# Altium PCB top.PcbDoc (part 1 of 2)
Units mm, origin at the board's own origin, x right, y up, seen from the top; angles counter-clockwise.
Board outline 63 x 37 mm, 4 copper layers (L1 (SIG/PWR), L2 (GND), L3 (GND), L4 (SIG/PWR)), stack 1.586 mm thick; 82 components, 50 nets, 261 pads, 300 vias.
Unrouted connection lines stored in the file: 3.
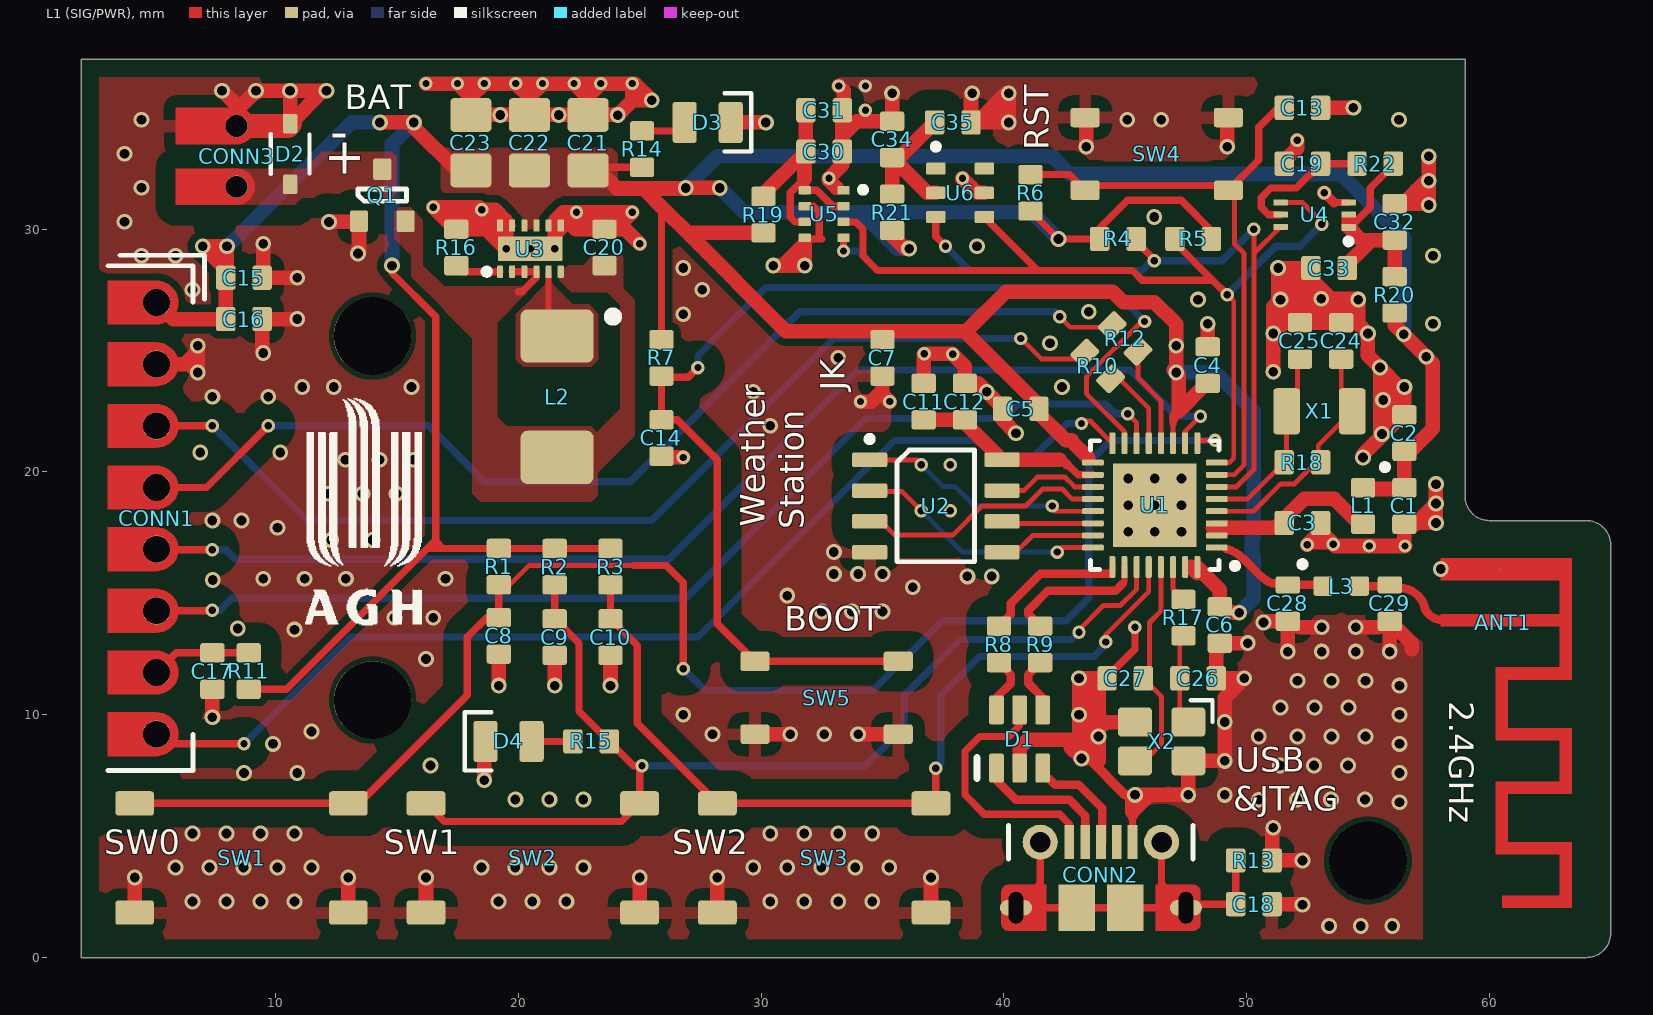
[diagram p0: L1 (SIG/PWR) view]
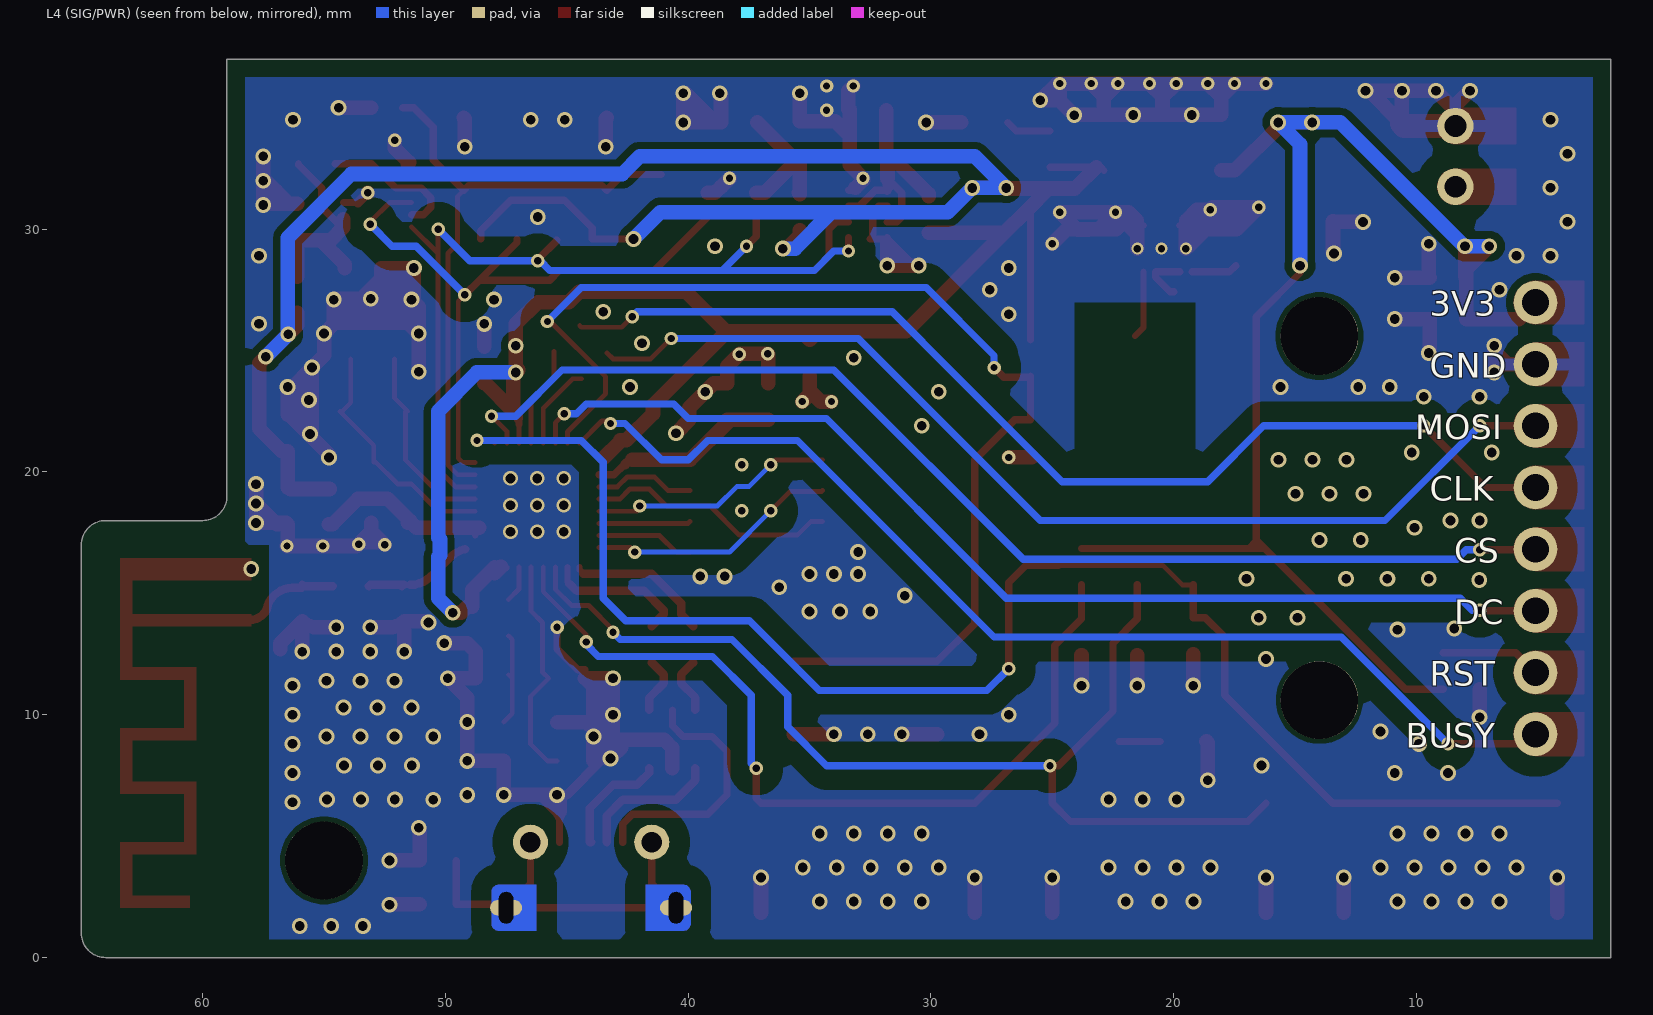
[diagram p1: L4 (SIG/PWR) view, seen from below]
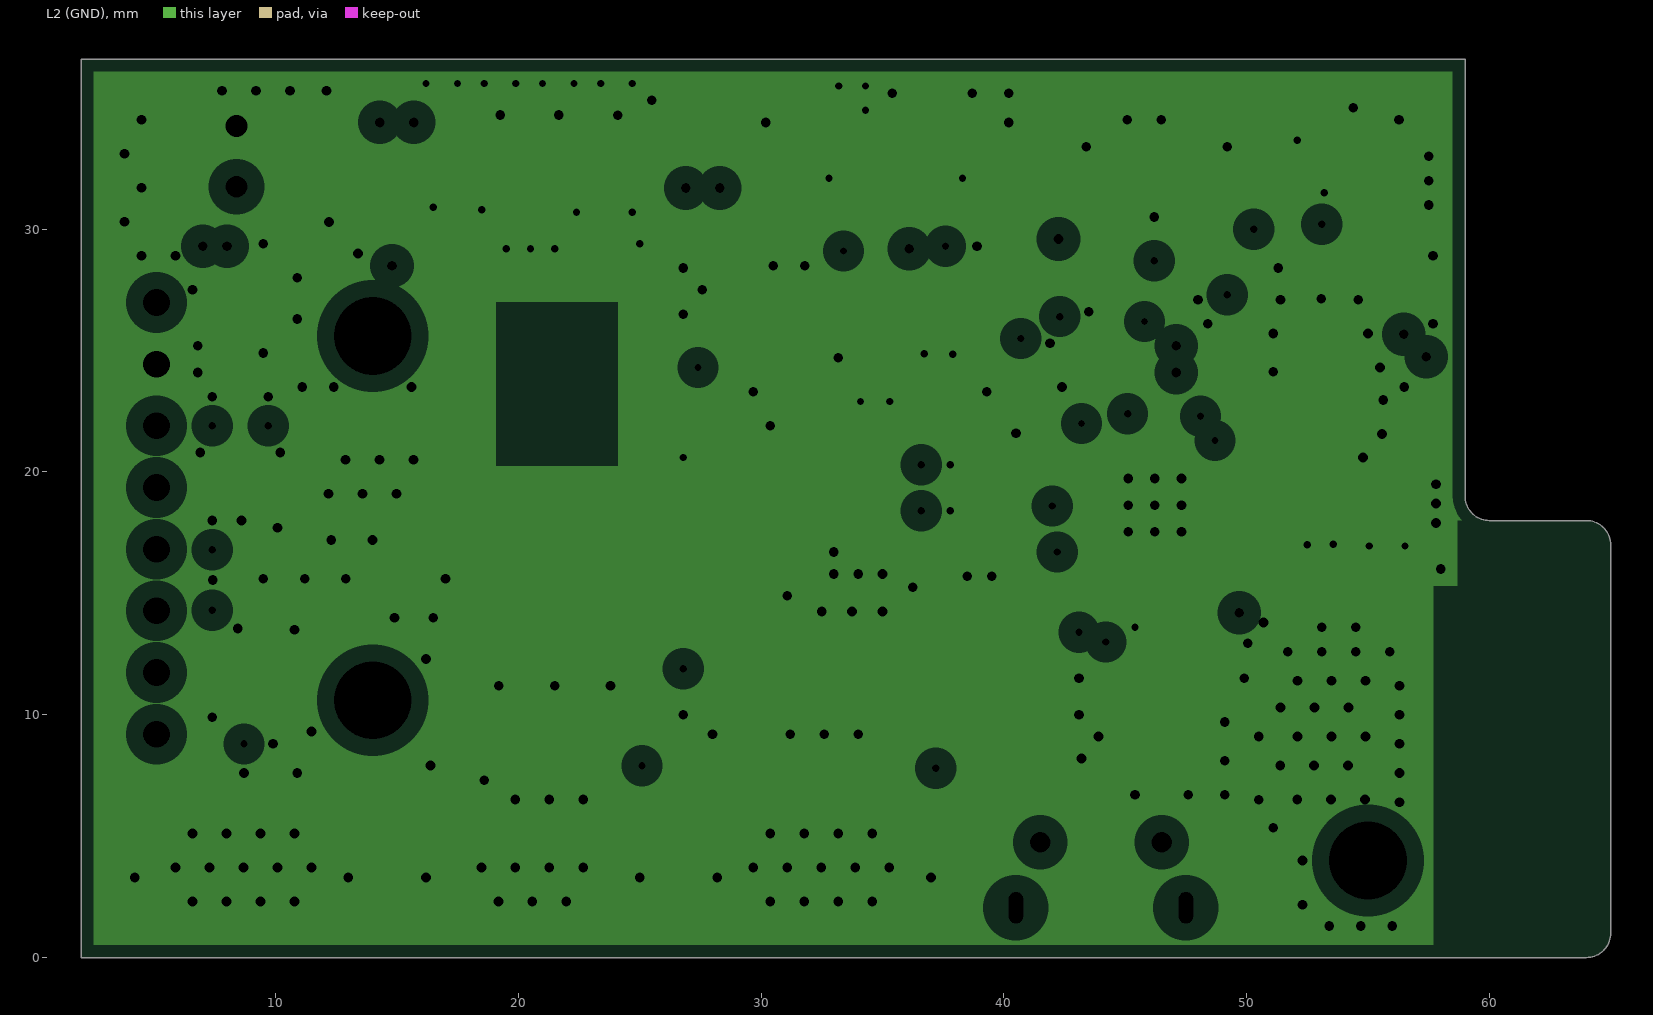
[diagram p2: L2 (GND), clearances drawn from the general rule]
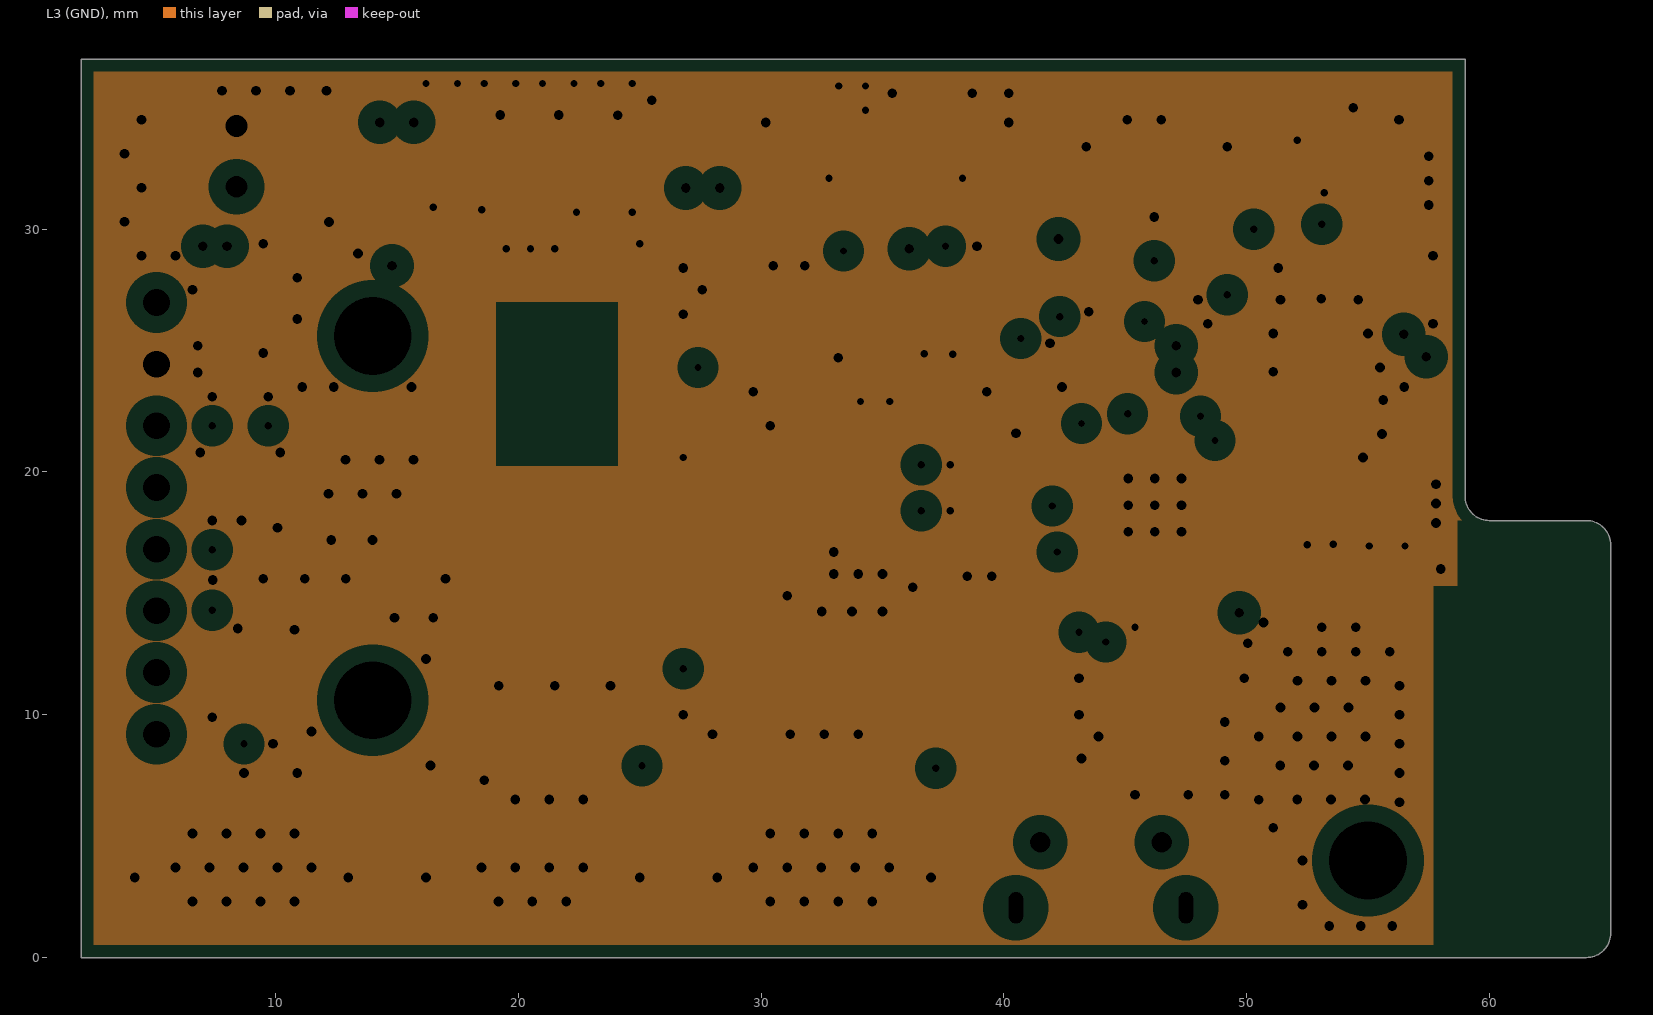
[diagram p3: L3 (GND), clearances drawn from the general rule]
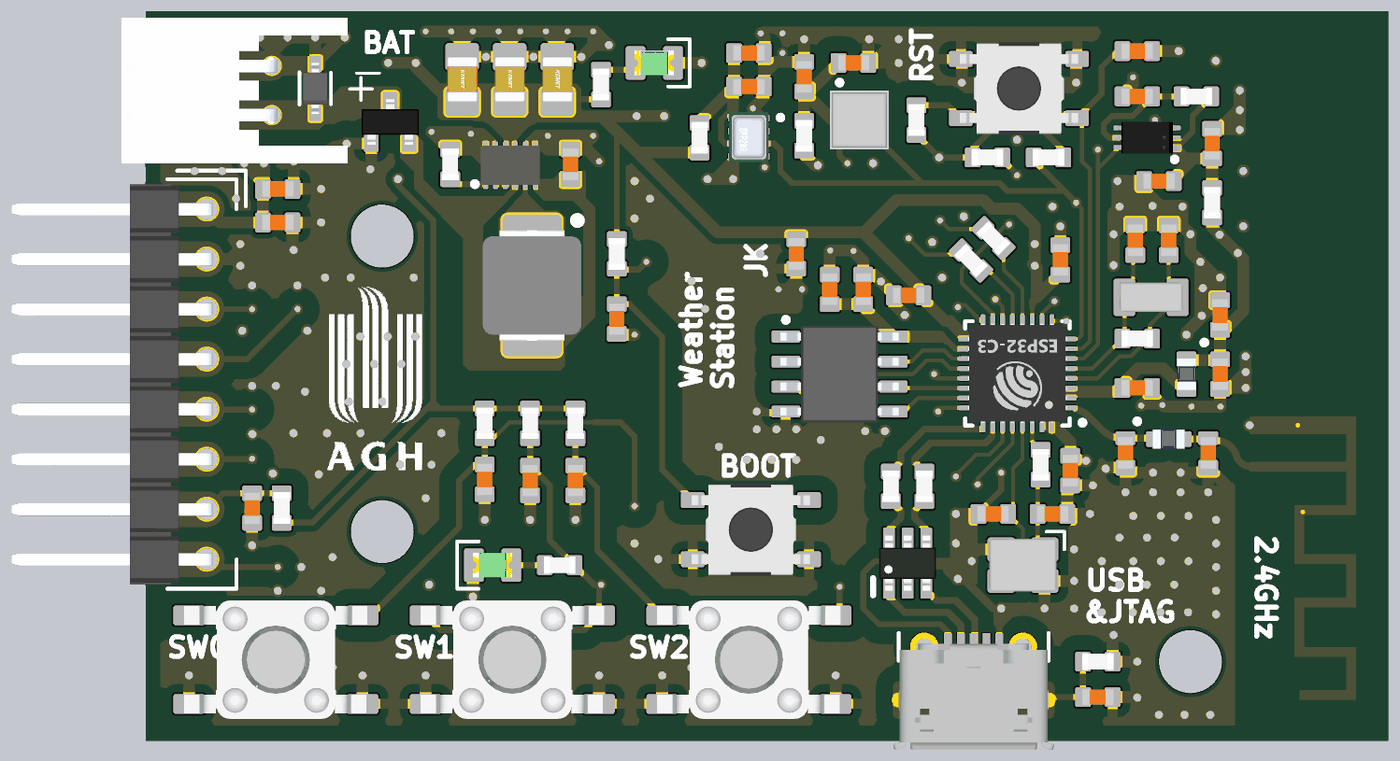
[diagram p4: 3D render of the assembled board from above, using the file's embedded part models]

## Layer stack, top to bottom
Top Solder: solder mask 0.0305, SM-001, Dk 3.8
L1 (SIG/PWR): signal copper 0.035
PP1_7628: prepreg 0.2104, PP-022, Dk 4.4
L2 (GND): plane copper 0.0152, net GND
Core: core 1.065, Core-039, Dk 4.6
L3 (GND): plane copper 0.0152, net GND
PP2_7628: prepreg 0.2104, PP-022, Dk 4.4
L4 (SIG/PWR): signal copper 0.035
Bottom Solder: solder mask 0.0305, SM-001, Dk 3.8

## Board outline
60,18 64,18 cw(c64,17) 65,17 65,1 cw(c64,1) 64,0 2,0 2,37 59,37 59,19 ccw(c60,19)

## Design rules (kind name [scope] priority, off if disabled: settings)
Clearance VIN_Clearance [InNet('VIN')] p1: gap=0.2 ignorepadtopadclearanceinfootprint=FALSE except(0.3: Arc-Fill Arc-Poly Arc-Region Track-Fill Track-Poly Track-Region SMDPad-Fill SMDPad-Poly SMDPad-Region THPad-Fill THPad-Poly THPad-Region Via-Fill Via-Poly Via-Region Fill-Fill Fill-Poly Fill-Region Poly-Poly Poly-Region Region-Region)
Clearance +3V3_Clearance [InNet('+3V3')] p2: gap=0.2 ignorepadtopadclearanceinfootprint=FALSE except(0.3: Arc-Fill Arc-Poly Arc-Region Track-Fill Track-Poly Track-Region SMDPad-Fill SMDPad-Poly SMDPad-Region THPad-Fill THPad-Poly THPad-Region Via-Fill Via-Poly Via-Region Fill-Fill Fill-Poly Fill-Region Poly-Poly Poly-Region Region-Region)
Clearance RF_Clearance [InNetClass('RF')] p3: gap=0.8 ignorepadtopadclearanceinfootprint=FALSE except(0.4: Arc-Arc Arc-Track Arc-SMDPad Arc-THPad Arc-Via Track-Track Track-SMDPad Track-THPad Track-Via SMDPad-SMDPad SMDPad-THPad SMDPad-Via THPad-THPad THPad-Via Via-Via) // >3x prepreg 1 height
Clearance USB_differential [InNetClass('DIFF')] p4: gap=0.4 ignorepadtopadclearanceinfootprint=FALSE // >3x prepreg 1 height
Clearance All_Clearance [All] p5: gap=0.2 ignorepadtopadclearanceinfootprint=FALSE except(0.85: Arc-Fill Arc-Poly Arc-Region Track-Fill Track-Poly Track-Region SMDPad-Fill SMDPad-Poly SMDPad-Region THPad-Fill THPad-Poly THPad-Region Via-Fill Via-Poly Via-Region Fill-Fill Fill-Poly Fill-Region Poly-Poly Poly-Region Region-Region)
DiffPairsRouting USB_Routing [InDifferentialPairClass('DIFF_USB')] p1: maxlimit=0.36 minlimit=0.25 mostfreqgap=0.36 toplayer_minwidth=0.25 toplayer_maxwidth=0.35 toplayer_prefwidth=0.35 impedanceprofiledriven=TRUE impedanceprofileid={658B0CB4-3C0B-4E19-9003-73B862119E18} impedanceprofilevalue=90.000000 maxuncoupledlength=12.7
PlaneClearance [All] p1: clearance=0.7
PlaneConnect [All] p1: planeconnectstyle=Direct reliefexpansion=0.5 reliefentries=4 reliefconductorwidth=0.5 reliefairgap=0.3
PolygonConnect GND_Thermal_Connection [InNet('GND')] p1: thpad.connectstyle=Relief thpad.reliefconductorwidth=0.5 thpad.reliefentries=4 thpad.polygonreliefangle="90 Angle" thpad.airgapwidth=0.5 smdpad.connectstyle=Relief smdpad.reliefconductorwidth=0.5 smdpad.reliefentries=4 smdpad.polygonreliefangle="90 Angle" smdpad.airgapwidth=0.5 via.connectstyle=Direct via.reliefconductorwidth=0.254 via.reliefentries=4 via.polygonreliefangle="90 Angle" via.airgapwidth=0.254
PolygonConnect Polygon_Connect [All] p2: connectstyle=Direct reliefconductorwidth=0.5 reliefentries=4 polygonreliefangle="90 Angle" airgapwidth=0.2
RoutingVias Routing_Vias [All] p1: holewidth=0.4 width=0.65 viastyle="Through Hole" minholewidth=0.3 minwidth=0.55 maxholewidth=2 maxwidth=2.4
ShortCircuit Antenna_Feed_GND [InNet('ANTENNA') vs InNet('GND')] p1: allowed=TRUE
ShortCircuit [All] p2: allowed=FALSE
SolderMaskExpansion [All] p1: expansion=0.102 istentingtop=FALSE
SupplyNets "Schematic Supply Nets_10" [InNet('+3V3_BH')] p1: voltage=0.000
SupplyNets "Schematic Supply Nets_9" [InNet('+3V3SPI')] p2: voltage=0.000
SupplyNets "Schematic Supply Nets_8" [InNet('+3V3_AHT')] p3: voltage=0.000
SupplyNets "Schematic Supply Nets_7" [InNet('+3V3_BMP')] p4: voltage=0.000
SupplyNets "Schematic Supply Nets_6" [InNet('GND')] p5: voltage=0.000
SupplyNets "Schematic Supply Nets_5" [InNet('VBAT+')] p6: voltage=0.000
SupplyNets "Schematic Supply Nets_4" [InNet('VIN')] p7: voltage=0.000
SupplyNets "Schematic Supply Nets_3" [InNet('+3V3')] p8: voltage=0.000
SupplyNets "Schematic Supply Nets_2" [InNet('VBUS')] p9: voltage=0.000
SupplyNets "Schematic Supply Nets" [InNet('+3V3A')] p10: voltage=0.000
UnRoutedNet [All] p1: checkbadconnections=TRUE
Width RF_Width [InNetClass('RF')] p1: maxlimit=0.35 minlimit=0.2 preferedwidth=0.35 impedanceprofiledriven=TRUE impedanceprofileid={323C2574-0328-402D-9162-A2FF2E712716} impedanceprofilevalue=50.000000 minimp=50.000000 maximp=50.000000 favimp=50.000000
Width PWR_Width [InNetClass('PWR')] p2: maxlimit=2 minlimit=0.2 preferedwidth=0.6 minimp=50.000000 maximp=50.000000 favimp=50.000000
Width All_Width [All] p3: maxlimit=2 minlimit=0.2 preferedwidth=0.3 minimp=50.000000 maximp=50.000000 favimp=50.000000
25 further rules are at their usual default settings.

## Classes and differential pairs
net class DIFF_USB: MCU_USB_D_N MCU_USB_D_P USB_N USB_P USB_P_N USB_P_P
net class PWR: +3V3 +3V3_AHT +3V3_BH +3V3_BMP +3V3A +3V3SPI GND VBAT+ VBUS VIN
net class RF: ANTENNA LNA
differential pair class DIFF_USB: MCU_USB_D USB USB_P
component class top: C1 C2 C3 C4 C5 C6 C7 C8 C9 C10 C11 C12 C13 C14 C15 C16 C17 C18 C20 C21 C22 C23 CONN1 CONN2 CONN3 D1 D2 D3 D4 L1 L2 Q1 R1 R2 R3 R4 R5 R6 R7 R8 R9 R10 R11 R12 R13 R14 R15 R16 SW1 SW2 SW3 SW4 SW5 U1 U2 U3
component class "RF Matching and Antenna": ANT1 C28 C29 L3
component class "I2C Sensors": C19 C30 C31 C32 C33 C34 C35 R19 R20 R21 R22 U4 U5 U6
component class Crystals: C24 C25 C26 C27 R17 R18 X1 X2
differential pair USB: +USB_P -USB_N
differential pair USB_P: +USB_P_P -USB_P_N
differential pair MCU_USB_D: +MCU_USB_D_P -MCU_USB_D_N

## Components (designator, comment, footprint, x,y, rotation, side; value= is the part's Value field where it differs from the comment)
ANT1 "PCB_Antenna" ANT_PIFA_2_4GHZ_50R_WS 58,16 r270 top
C1 "10u" CAP_0603#1 56.5,18.6 r90 top locked
C2 "100n" CAP_0603#1 56.5,21.6 r270 top
C3 "1u" CAP_0603#1 52.3,17.9 r180 top locked
C4 "100n" CAP_0603#1 48.4,24.4 r270 top
C5 "100n" CAP_0603#1 40.7,22.6 r0 top
C6 "100n" CAP_0603#1 48.9,13.7 r90 top
C7 "10u" CAP_0603#1 35,24.7 r90 top
C8 "100n" CAP_0603#1 19.2,13.25 r90 top locked
C9 "100n" CAP_0603#1 21.5,13.2 r90 top locked
C10 "100n" CAP_0603#1 23.8,13.2 r90 top locked
C11 "100n" CAP_0603#1 36.7,22.9 r270 top
C12 "10u" CAP_0603#1 38.4,22.9 r270 top
C13 "1u" CAP_0603#1 52.3,35 r180 top
C14 "100n" CAP_0603#1 25.9,21.4 r90 top locked
C15 "100n" CAP_0603#1 8.7,28 r180 top
C16 "10u" CAP_0603#1 8.7,26.3 r180 top
C17 "1u" CAP_0603#1 7.4,11.8 r90 top
C18 "100p" CAP_0603#1 50.3,2.2 r0 top locked
C19 "1u" CAP_0603#1 52.3,32.7 r0 top
C20 "10u" CAP_0603#1 23.55,29.25 r270 top locked
C21 "22u" CAP_0805 22.876,33.565 r270 top locked
C22 "22u" CAP_0805 20.463,33.565 r270 top locked
C23 "22u" CAP_0805 18.05,33.565 r270 top locked
C24 "15p" CAP_0603#1 53.9,25.4 r270 top
C25 "15p" CAP_0603#1 52.2,25.4 r270 top
C26 "22p" CAP_0603#1 48,11.5 r180 top locked
C27 "22p" CAP_0603#1 45,11.5 r0 top locked
C28 "C" CAP_0603#2 51.7,14.6 r90 top locked
C29 "C" CAP_0603#2 55.9,14.6 r90 top locked
C30 "100n" CAP_0603#1 32.6,33.2 r180 top locked
C31 "10u" CAP_0603#1 32.6,34.9 r180 top locked
C32 "100n" CAP_0603#1 56.1,30.3 r270 top
C33 "10u" CAP_0603#1 53.4,28.4 r0 top
C34 "100n" CAP_0603#1 35.4,33.7 r270 top locked
C35 "10u" CAP_0603#1 37.9,34.4 r180 top locked
CONN1 "GOLDPIN_8x1" GPx8_2.54mm_LONG_PADS_90deg 5.1,18.09 r0 top locked
CONN2 "CONN_microUSB_B" USB_B_105017-0001 44,3.4 r0 top locked
CONN3 "2x2.5mm_JST_90deg_Female_Connector" "2x2.5mm_JST_Female_Connector_90deg _Long_Pads" 8.4,33 r90 top locked
D1 "USBLC6-2SC6" SOT-23-6 40.65,9 r0 top
D2 "TVS_UNI" TVS_BI 10.6,33.1 r90 top
D3 "LED_SMD_GREEN" LED_0805_GREEN 27.8,34.4 r180 top
D4 "LED_SMD_GREEN" LED_0805_GREEN 19.6,8.9 r0 top locked
L1 "2u2" L_0603#1 54.8,18.6 r270 top locked
L2 "2u2" HPI0530-2R2 21.6,23.1 r270 top locked
L3 "L" L_0603#2 53.9,15.3 r0 top locked
Q1 "SI2323DS-T1-E3" SOT-23-3 14.4,31.4 r0 top locked
R1 "5k1" RES_0603 19.2,16.1 r90 top locked
R2 "5k1" RES_0603 21.5,16.1 r90 top locked
R3 "5k1" RES_0603 23.8,16.1 r90 top locked
R4 "2k2" RES_0603 44.7,29.6 r0 top locked
R5 "2k2" RES_0603 47.8,29.6 r180 top locked
R6 "10k" RES_0603 41.1,31.5 r270 top locked
R7 "5k1" RES_0603 25.9,24.7 r90 top locked
R8 "0R" RES_0603 39.8,12.9 r270 top
R9 "0R" RES_0603 41.5,12.9 r270 top
R10 "0R" RES_0603 43.869,24.369 r315 top
R11 "10k" RES_0603 8.9,11.8 r270 top
R12 "0R" RES_0603 45,25.5 r315 top
R13 "10M" RES_0603 50.3,4 r0 top locked
R14 "1k" RES_0603 25.1,33.3 r270 top locked
R15 "1k" RES_0603 23,8.9 r0 top locked
R16 "4k75 1%" RES_0603 17.45,29.25 r270 top locked
R17 "22R" RES_0603 47.4,14 r90 top
R18 "10M" RES_0603 52.3,20.4 r0 top
R19 "0R" RES_0603 30.1,30.6 r90 top locked
R20 "0R" RES_0603 56.1,27.3 r90 top
R21 "0R" RES_0603 35.4,30.7 r90 top locked
R22 "10k" RES_0603 55.3,32.7 r0 top
SW1 "TACT_SWITCH_SMD_19mm" TACT_SW_19mm 8.6,4.1 r180 top
SW2 "TACT_SWITCH_SMD_19mm" TACT_SW_19mm 20.6,4.1 r180 top
SW3 "TACT_SWITCH_SMD_19mm" TACT_SW_19mm 32.6,4.1 r180 top
SW4 "TACT_SWITCH_19mm" TACT_SW 46.3,33.1 r0 top locked
SW5 "TACT_SWITCH_19mm" TACT_SW 32.7,10.7 r180 top locked
U1 "ESP32-C3" ESP32-C3_QFN32_5x5-0.5 46.221,18.634 r180 top locked
U2 "IS25LP032D-JNLE" SOIC-8 37.2,18.6 r0 top
U3 "TPS61094DSSR" WSON-12 20.5,29.2 r90 top locked
U4 "BH1750" BH1750 52.8,30.6 r180 top
U5 "BMP280" BMP280 32.6,30.625 r0 top locked
U6 "AHT20" AHT20 38.2,31.5 r0 top locked
X1 "XTAL_3215_NO_GND" LFXTAL009678REEL 53,22.5 r180 top
X2 "XTAL_3225" LFXTAL035270BULK 46.5,8.9 r180 top locked

## Footprints (in the part's own frame and the unit in brackets; to place one, negate y for a bottom-side part, rotate by r counter-clockwise, add the part's x,y. Pads: shape width x height; smd on the part's side, far side on the other; paste and mask are expansions set on the pad)
"2x2.5mm_JST_Female_Connector_90deg _Long_Pads" [mm] "2x2.5mm JST Female Connector 90 deg"
  round 0.925 / inner round 1.5 / far side round 1.5 hole 0.9 mask+0.05: 1(-1.25,0) 2(1.25,0)
  L1 (SIG/PWR) region: 2,1.25 2,2.5 0.5,2.5 0.5,0 0.557,-0.287 0.72,-0.53 0.963,-0.693 1.25,-0.75 1.25,-0.75 1.537,-0.693 1.78,-0.53 1.943,-0.287 2,0 2,0
  L1 (SIG/PWR) region: -0.5,1.25 -0.5,2.5 -2,2.5 -2,0 -1.943,-0.287 -1.78,-0.53 -1.537,-0.693 -1.25,-0.75 -1.25,-0.75 -0.963,-0.693 -0.72,-0.53 -0.557,-0.287 -0.5,0 -0.5,0
  body extent -3.7,-3.85 3.7,7.65, height 6.1
AHT20 [mm] "AHT20 sensor"
  rrect25% 0.8x0.5 smd mask+0.05: 1(-1,1) 2(-1,0) 3(-1,-1) 4(1,-1) 5(1,0) 6(1,1)
  silkscreen extent -1.12,1.78 -0.88,2.02, body extent -1.5,-1.5 1.5,1.5, height 1.04
ANT_PIFA_2_4GHZ_50R_WS [mil] "PCB 2.4 GHz 50 Ohm antenna - measured with VNA in weather station design"
  round 1 smd paste-99999 mask+4: 1(173.23,106.3) 2(0,96.46)
  L1 (SIG/PWR) region: 17.72,0 17.72,192.91 -17.72,192.91 -17.72,0
  L1 (SIG/PWR) region: -17.72,192.91 72.83,192.91 72.83,0 92.52,0 92.52,192.91 159.45,192.91 159.45,88.98 277.56,88.98 277.56,192.91 344.49,192.91 344.49,88.98 462.6,88.98 462.6,192.91 529.53,192.91 529.53,100 549.21,100 549.21,212.6 442.91,212.6 442.91,108.66 364.17,108.66 364.17,212.6 257.87,212.6 257.87,108.66 179.13,108.66 179.13,192.91 179.13,212.6 -17.72,212.6
BH1750 [mm] "BH1750 in WSOF6I package"
  rrect25% 0.6x0.3 smd mask+0.05: 1(-1.4,0.525)
  rrect25% 0.6x0.25 smd mask+0.05: 2(-1.4,0) 3(-1.4,-0.5) 4(1.4,-0.5) 5(1.4,0) 6(1.4,0.5)
  silkscreen extent -1.52,0.98 -1.28,1.22, body extent -1.5,-0.8 1.5,0.8, height 0.75
BMP280 [mm] "BMP280 in 2x2.5x0.95mm LGA package"
  rrect25% 0.5x0.35 smd mask+0.05: 1(0.8,0.975) 2(0.8,0.325) 3(0.8,-0.325) 4(0.8,-0.975) 5(-0.8,-0.975) 6(-0.8,-0.325) 7(-0.8,0.325) 8(-0.8,0.975)
  silkscreen extent 1.48,0.88 1.72,1.12, body extent -1,-1.25 1,1.25, height 1
CAP_0603#1 [mm]
  rrect25% 0.8x1 smd: 1(-0.75,0) 2(0.75,0)
  body extent -0.8,-0.4 0.8,0.4, height 0.51
CAP_0603#2 [mm]
  rrect25% 0.8x1 smd: 1(-0.75,0)
  rrect25% 0.7x1 smd: 2(0.75,0)
  body extent -0.8,-0.4 0.8,0.4, height 0.51
CAP_0805 [mm]
  rrect25% 1.4x1.7 smd: 1(-1.143,0) 2(1.143,0)
  body extent -1.15,-0.76 1.15,0.79, height 1.01
ESP32-C3_QFN32_5x5-0.5 [mm]
  rrect50% 0.9x0.25 smd mask+0.05: 1(-2.55,1.75) 2(-2.55,1.25) 3(-2.55,0.75) 4(-2.55,0.25) 5(-2.55,-0.25) 6(-2.55,-0.75) 7(-2.55,-1.25) 8(-2.55,-1.75) 17(2.55,-1.75) 18(2.55,-1.25) 19(2.55,-0.75) 20(2.55,-0.25) 21(2.55,0.25) 22(2.55,0.75) 23(2.55,1.25) 24(2.55,1.75)
  rrect50% 0.25x0.9 smd mask+0.05: 9(-1.75,-2.55) 10(-1.25,-2.55) 11(-0.75,-2.55) 12(-0.25,-2.55) 13(0.25,-2.55) 14(0.75,-2.55) 15(1.25,-2.55) 16(1.75,-2.55) 25(1.75,2.55) 26(1.25,2.55) 27(0.75,2.55) 28(0.25,2.55) 29(-0.25,2.55) 30(-0.75,2.55) 31(-1.25,2.55) 32(-1.75,2.55)
  rect 3.45x3.45 smd mask+0.05: 33(0,0)
  silkscreen extent -3.43,-2.65 2.65,2.65, body extent -2.5,-2.5 2.5,2.5, height 1.13
GPx8_2.54mm_LONG_PADS_90deg [mm] "Goldpin 2.54 mm x8 90 degrees junction with long pads"
  round 1.125 / inner round 1.8 / far side round 1.8 hole 1.1 mask+0.07: 1(0,8.89) 2(0,6.35) 3(0,3.81) 4(0,1.27) 5(0,-1.27) 6(0,-3.81) 7(0,-6.35) 8(0,-8.89)
  L1 (SIG/PWR) region: 0,-7.99 -2,-7.99 -2,-9.79 0,-9.79 0.344,-9.721 0.636,-9.526 0.831,-9.234 0.9,-8.89 0.9,-8.89 0.831,-8.546 0.636,-8.254 0.344,-8.059 0,-7.99
  L1 (SIG/PWR) region: 0,-5.45 -2,-5.45 -2,-7.25 0,-7.25 0.344,-7.181 0.636,-6.986 0.831,-6.694 0.9,-6.35 0.9,-6.35 0.831,-6.006 0.636,-5.714 0.344,-5.519 0,-5.45
  L1 (SIG/PWR) region: 0,-2.91 -2,-2.91 -2,-4.71 0,-4.71 0.344,-4.641 0.636,-4.446 0.831,-4.154 0.9,-3.81 0.9,-3.81 0.831,-3.466 0.636,-3.174 0.344,-2.979 0,-2.91
  L1 (SIG/PWR) region: 0,-0.37 -2,-0.37 -2,-2.17 0,-2.17 0.344,-2.101 0.636,-1.906 0.831,-1.614 0.9,-1.27 0.9,-1.27 0.831,-0.926 0.636,-0.634 0.344,-0.439 0,-0.37
  L1 (SIG/PWR) region: 0,2.17 -2,2.17 -2,0.37 0,0.37 0.344,0.439 0.636,0.634 0.831,0.926 0.9,1.27 0.9,1.27 0.831,1.614 0.636,1.906 0.344,2.101 0,2.17
  L1 (SIG/PWR) region: 0,4.71 -2,4.71 -2,2.91 0,2.91 0.344,2.979 0.636,3.174 0.831,3.466 0.9,3.81 0.9,3.81 0.831,4.154 0.636,4.446 0.344,4.641 0,4.71
  L1 (SIG/PWR) region: 0,7.25 -2,7.25 -2,5.45 0,5.45 0.344,5.519 0.636,5.714 0.831,6.006 0.9,6.35 0.9,6.35 0.831,6.694 0.636,6.986 0.344,7.181 0,7.25
  L1 (SIG/PWR) region: 0,9.79 -2,9.79 -2,7.99 0,7.99 0.344,8.059 0.636,8.254 0.831,8.546 0.9,8.89 0.9,8.89 0.831,9.234 0.636,9.526 0.344,9.721 0,9.79
  silkscreen extent -2,-10.39 1.97,10.84, body extent -9.91,-10.18 0.31,10.15, height 2.51
HPI0530-2R2 [mm] "Coil SMD 5x5x2m8 mm"
  rrect25% 2.2x3 smd: 1(-2.5,0) 2(2.5,0)
  silkscreen extent -3.42,2.18 -3.18,2.42, body extent -2.8,-2.5 2.8,2.5, height 3.11
L_0603#1 [mm]
  rrect25% 0.8x1 smd: 1(-0.75,0) 2(0.75,0)
  silkscreen extent -1.72,0.78 -1.48,1.03, body extent -0.8,-0.48 0.8,0.48, height 0.8
L_0603#2 [mm]
  rrect25% 0.8x0.8 smd: 1(-0.75,0) 2(0.75,0)
  silkscreen extent -1.72,0.78 -1.47,1.02, body extent -0.8,-0.48 0.8,0.48, height 0.8
LED_0805_GREEN [mm]
  rrect25% 1x1.7 smd: A(0.95,0) K(-0.95,0)
  silkscreen extent -1.8,-1.2 -0.7,1.2, body extent -1,-0.63 1,0.63, height 1.12
LFXTAL009678REEL [mm] "32.768 kHz crystal SMD 3.2x1.5x0.9mm"
  rrect25% 1.1x1.9 smd: 1(-1.35,0) 2(1.35,0)
  body extent -1.6,-0.75 1.6,0.75, height 0.94
LFXTAL035270BULK [mm] "40MHz crystal SMD 3.4x2.7x0.8mm"
  rrect25% 1.4x1.2 smd: 1(-1.1,-0.8) 2(1.1,-0.8) 3(1.1,0.8) 4(-1.1,0.8)
  silkscreen extent -2.1,-1.7 -1.2,-0.8, body extent -1.7,-1.35 1.7,1.35, height 0.84
RES_0603 [mm]
  rrect25% 0.8x1 smd: 1(-0.75,0) 2(0.75,0)
  body extent -0.8,-0.43 0.8,0.43, height 0.52
SOIC-8 [mm] "SOIC, 8-Leads, Body 4.91x3.90mm, Pitch 1.27mm, IPC Medium Density"
  rrect25% 1.45x0.6 smd: 1(-2.725,1.905) 2(-2.725,0.635) 3(-2.725,-0.635) 4(-2.725,-1.905) 5(2.725,-1.905) 6(2.725,-0.635) 7(2.725,0.635) 8(2.725,1.905)
  silkscreen extent -2.85,-2.3 1.6,2.88, body extent -3,-2.45 3,2.45, height 1.76
SOT-23-3 [mm]
  rrect25% 0.75x0.9 smd: 1(-0.96,-1.07) 2(0.96,-1.07) 3(0,1.07)
  silkscreen extent -1,-0.25 1,0.25, body extent -1.45,-1.15 1.45,1.15, height 1.01
SOT-23-6 [mm]
  rrect25% 0.6x1.2 smd: 1(-0.95,-1.2) 2(0,-1.2) 3(0.95,-1.2) 4(0.95,1.2) 5(0,1.2) 6(-0.95,1.2)
  silkscreen extent -1.75,-1.63 -1.75,-0.76, body extent -1.45,-1.4 1.45,1.4, height 1.45
TACT_SW [mm] "Tact switch SPST-NO"
  rrect25% 1.2x0.8 smd: 1(-2.95,1.5) 1(2.95,1.5) 2(-2.95,-1.5) 2(2.95,-1.5)
  body extent -3,-2.36 3,2.36, height 1.56
TACT_SW_19mm [mm] "19 mm tact switch SPST-NO"
  rrect25% 1.6x1 smd: 1(-4.4,2.25) 1(4.4,2.25) 2(-4.4,-2.25) 2(4.4,-2.25)
  body extent -4.65,-3 4.65,3, height 19.15
TVS_BI [mm] "Bidirectional TVS Diode in SOD323 package"
  rrect25% 0.8x0.6 smd: 1(-1.25,0) 2(1.25,0)
  silkscreen extent -0.82,-0.8 0.83,0.8, body extent -1.3,-0.64 1.3,0.64, height 1.18
USB_B_105017-0001 [mm] "Micro USB type B socket; Molex 105017-0001"
  rect 0.4x1.4 smd mask+0.05: 1(-1.3,1.35) 2(-0.65,1.35) 3(0,1.35) 4(0.65,1.35) 5(1.3,1.35)
  oval 1.325x0.625 hole 0.6 slot 1.3 at 90 deg mask+0.05: 6(-3.5,-1.35) 6(3.5,-1.35)
  round 1.45 hole 0.85 mask+0.05: 6(-2.5,1.35) 6(2.5,1.35)
  rect 1.5x1.9 smd mask+0.05: 6(-1,-1.35) 6(1,-1.35)
  L1 (SIG/PWR) region: 2.375,-2.3 2.25,-2.3 2.25,-2.3 2.25,-0.4 2.5,-0.4 3.8,-0.4 3.915,-0.423 4.012,-0.488 4.077,-0.585 4.1,-0.7 4.1,-0.7 4.1,-2 4.077,-2.115 4.012,-2.212 3.915,-2.277 3.8,-2.3 3.8,-2.3 3.5,-2.3
  L1 (SIG/PWR) region: -2.375,-0.4 -2.25,-0.4 -2.25,-0.4 -2.25,-2.3 -2.5,-2.3 -3.8,-2.3 -3.915,-2.277 -4.012,-2.212 -4.077,-2.115 -4.1,-2 -4.1,-2 -4.1,-0.7 -4.077,-0.585 -4.012,-0.488 -3.915,-0.423 -3.8,-0.4 -3.8,-0.4 -3.5,-0.4
  L4 (SIG/PWR) region: 2.375,-2.3 2.25,-2.3 2.25,-2.3 2.25,-0.4 2.5,-0.4 3.8,-0.4 3.915,-0.423 4.012,-0.488 4.077,-0.585 4.1,-0.7 4.1,-0.7 4.1,-2 4.077,-2.115 4.012,-2.212 3.915,-2.277 3.8,-2.3 3.8,-2.3 3.5,-2.3
  L4 (SIG/PWR) region: -2.375,-0.4 -2.25,-0.4 -2.25,-0.4 -2.25,-2.3 -2.5,-2.3 -3.8,-2.3 -3.915,-2.277 -4.012,-2.212 -4.077,-2.115 -4.1,-2 -4.1,-2 -4.1,-0.7 -4.077,-0.585 -4.012,-0.488 -3.915,-0.423 -3.8,-0.4 -3.8,-0.4 -3.5,-0.4
  silkscreen extent -3.8,0.65 3.8,2.05, body extent -4.1,-3.9 4.1,1.5, height 2.67
WSON-12 [mm]
  rrect25% 0.5x0.25 smd mask+0.05: 1(-0.95,1.25) 2(-0.95,0.75) 3(-0.95,0.25) 4(-0.95,-0.25) 5(-0.95,-0.75) 6(-0.95,-1.25) 7(0.95,-1.25) 8(0.95,-0.75) 9(0.95,-0.25) 10(0.95,0.25) 11(0.95,0.75) 12(0.95,1.25)
  rrect5% 1x2.65 smd mask+0.05: 13(0,0)
  silkscreen extent -1.07,1.68 -0.83,1.92, body extent -1,-1.5 1,1.5, height 0.81

## Part data
ANT1: library part ANT_PIFA_2_4GHZ_50R, "PCB 2.4 GHz 50 Ohm antenna", ComponentLink1Description=Datasheet
C1 C2 C4 C5 C6 C7 C8 C9 C10 C11 C12 C14 C15 C16 C20 C30 C31 C32 C33 C34 C35: library part CAP_0603, "Capacitor SMD 0603", Manufacturer=SAMSUNG, ComponentLink1Description="Distributor Link"
  C1 C7 C12 C16 C20 C31 C33 C35: ComponentLink1URL=https://www.tme.eu/pl/details/cl10a106mo8nqnc/kondensatory-mlcc-smd/samsung/
  C2 C4 C5 C6 C8 C9 C10 C11 C14 C15 C30 C32 C34: ComponentLink1URL=https://www.tme.eu/pl/details/cl10b104kb8nnnc/kondensatory-mlcc-smd/samsung/
C3 C13 C17 C19: library part CAP_0603, "Capacitor SMD 0603", Manufacturer=SAMSUNG, Manufacturer Part Number=CL10B105KO8NNND, ComponentLink1Description="Distributor Link", ComponentLink1URL=https://www.tme.eu/pl/details/cl10b105ko8nnnd/kondensatory-mlcc-smd/samsung/
C18: library part CAP_0603, "Capacitor SMD 0603", Manufacturer=Samsung, Manufacturer Part Number=CL10C101JB8NNND, ComponentLink1Description="Distributor Link", ComponentLink1URL=https://www.tme.eu/pl/details/cl10c101jb8nnnd/kondensatory-mlcc-smd/samsung/
C21 C22 C23: library part CAP_0805, "Ceramic capacitor SMD 0805 X7R", Manufacturer=Samsung, ComponentLink1Description="Distributor Link", ComponentLink1URL=https://www.tme.eu/pl/details/cl21a226maynnne/kondensatory-mlcc-smd/samsung/
C24 C25: library part CAP_0603, "Capacitor SMD 0603", Manufacturer=Samsung, Manufacturer Part Number=CL10C150JB8NNNC, ComponentLink1Description="Distributor Link", ComponentLink1URL=https://www.tme.eu/pl/details/cl10c150jb8nnnc/kondensatory-mlcc-smd/samsung/
C26 C27: library part CAP_0603, "Capacitor SMD 0603", Manufacturer=Samsung, Manufacturer Part Number=CL10C220JB8NNND, ComponentLink1Description="Distributor Link", ComponentLink1URL=https://www.tme.eu/pl/details/cl10c220jb8nnnd/kondensatory-mlcc-smd/samsung/
C28 C29: library part CAP_0603, "Capacitor SMD 0603", ComponentLink1Description="Distributor Link"
CONN1: "Goldpin connector 2.54 mm; 8x1", ComponentLink1Description="Distributor Link", ComponentLink2Description="E-Ink Distributor Link", ComponentLink2URL=https://botland.com.pl/wyswietlacze-e-paper/9098-e-paper-e-ink-154-v21-200x200px-modul-z-wyswietlaczem-spi-waveshare-12955-5904422312497.html, ComponentLink3Description="E-Ink Datasheet", ComponentLink3URL=https://www.waveshare.com/w/upload/7/77/1.54inch_e-Paper_Datasheet.pdf, ComponentLink4Description="E-Ink Display Distributor Link", ComponentLink4URL=https://botland.com.pl/wyswietlacze-e-paper/9098-e-paper-e-ink-154-v21-200x200px-modul-z-wyswietlaczem-spi-waveshare-12955-5904422312497.html
CONN2: Manufacturer=Molex, Manufacturer Part Number=105017-0001, ComponentLink1Description="Distributor Link", ComponentLink1URL=https://www.tme.eu/pl/details/mx-105017-0001/zlacza-usb-i-ieee1394/molex/105017-0001/, ComponentLink2Description=Datasheet, ComponentLink2URL=https://www.tme.eu/Document/b7989e722b05f5084c507fb3ad8f02cb/MX-105017-0001.pdf
CONN3: library part 2x2.5mm_JST_Female_Connector, "2x2.5mm JST 90 Degree Angle Female Connector", Manufacturer=JST, Manufacturer Part Number="S2B-XH-A-1 (LF)(SN)", ComponentLink1Description="Distibutor Link", ComponentLink2Description=Datasheet, ComponentLink2URL=https://www.tme.eu/Document/0a99312bb6c67d3f0f7869fe9a023cea/XH.pdf, ComponentLink3Description="Distributor Link", ComponentLink3URL=https://www.tme.eu/pl/details/s2b-xh-a-1/zlacza-sygnalowe-raster-2-50mm/jst/s2b-xh-a-1-lf-sn/
D1: "Low-Capacitance ESD Protection USB", Manufacturer=STMicroelectronics, ComponentLink1Description="Distributor Link", ComponentLink1URL=https://www.tme.eu/pl/details/usblc6-2sc6/diody-zabezpieczajace-drabinki/stmicroelectronics/, Manufacturer Part Number=USBLC6-2SC6
D2: library part TVS_BI, "Unidirectional TVS diode in SOD323 package", Manufacturer="Diodes Incorporated", Manufacturer Part Number=SD03C-7, ComponentLink1Description="Distributor Link", ComponentLink1URL=https://www.tme.eu/pl/details/sd03c-7/diody-tvs-smd-dwukierunkowe/diodes-incorporated/, ComponentLink2Description=Datasheet, ComponentLink2URL=https://www.mouser.pl/datasheet/2/115/DIOD_S_A0009691204_1-2543345.pdf
D3: library part LED_SMD_0805_GREEN, "Green LED SMD 0805", Manufacturer=Broadcom, Manufacturer Part Number=HSMG-C170, ComponentLink1Description="Distributor Link", ComponentLink1URL=https://www.tme.eu/pl/details/hsmg-c170/diody-led-smd-kolorowe/broadcom-avago/, ComponentLink2Description=Datasheet, ComponentLink2URL=https://www.tme.eu/Document/63ab7d315fd8a426f46a244dda8ce81a/HSMG-C170.pdf
D4: library part LED_SMD_0805_GREEN, "Green LED SMD 0805", ComponentLink1Description="Distributor Link", ComponentLink2Description=Datasheet
L1: library part L_603, "Inductor SMD 0603", Manufacturer=Murata, Manufacturer Part Number=LQG18HN2N2S00D, ComponentLink1Description="Distributor Link", ComponentLink1URL=https://www.tme.eu/pl/details/lqg18hn2n2s00d/dlawiki/murata/
L2: library part HPI0530-2R2, "2.2uH, 24mOhm DC Series Resistance, 20% Inductance Tolerance SMD Coil", Manufacturer=FERROCORE, ComponentLink1Description="Distributor Link", ComponentLink1URL=https://www.tme.eu/pl/details/hpi0530-2r2/dlawiki/ferrocore/, ComponentLink2Description=Datasheet, ComponentLink2URL=https://www.tme.eu/Document/e149c9d15a89ae101acf458935804ce7/HPI0530.pdf, Manufacturer Part Number=HPI0530-2R2
L3: library part L_603, "Inductor SMD 0603", ComponentLink1Description="Distributor Link"
Q1: "P-channel MOSFET in SOT23 package", Manufacturer=Vishay, ComponentLink1Description="Distributor Link", ComponentLink1URL=https://www.tme.eu/pl/details/si2323ds-t1-e3/tranzystory-z-kanalem-p-smd/vishay/, ComponentLink2Description=Datasheet, ComponentLink2URL=https://www.tme.eu/Document/d8e01dd5bf2cb7c72a3df62d79c95bb8/SI2323DS-T1-E3.pdf, Manufacturer Part Number=SI2323DS-T1-E3
R1 R2 R3 R7: library part RES_0603, "Resistor SMD 0603", Manufacturer=YAEGO, Manufacturer Part Number=AC0603FR-075K1L, ComponentLink1Description="Distributor Link", ComponentLink1URL=https://www.tme.eu/pl/details/ac0603fr-075k1l/rezystory-smd/yageo/
R4 R5: library part RES_0603, "Resistor SMD 0603", Manufacturer=YAEGO, Manufacturer Part Number=AC0603FR-072K2L, ComponentLink1Description="Distributor Link"
  R4: ComponentLink1URL=https://www.tme.eu/pl/details/ac0603fr-072k2l/rezystory-smd/yageo/
  R5: ComponentLink1URL=https://www.tme.eu/pl/details/rc0603fr-0710k/rezystory-smd/yageo/rc0603fr-0710kl/
R6 R11 R22: library part RES_0603, "Resistor SMD 0603", Manufacturer=YAEGO, Manufacturer Part Number=RC0603FR-0710KL, ComponentLink1Description="Distributor Link", ComponentLink1URL=https://www.tme.eu/pl/details/rc0603fr-0710k/rezystory-smd/yageo/rc0603fr-0710kl/
R8 R9 R10 R12 R19 R20 R21: library part RES_0603, "Resistor SMD 0603", Manufacturer=YAEGO, Manufacturer Part Number=AC0603JR-070RL, ComponentLink1Description="Distributor Link", ComponentLink1URL=https://www.tme.eu/pl/details/ac0603jr-070rl/rezystory-smd/yageo/
R13 R18: library part RES_0603, "Resistor SMD 0603", Manufacturer=YAGEO, Manufacturer Part Number=RC0603FR-0710ML, ComponentLink1Description="Distributor Link", ComponentLink1URL=https://www.tme.eu/pl/details/rc0603fr-0710ml/rezystory-smd/yageo/
R14 R15: library part RES_0603, "Resistor SMD 0603", Manufacturer=YAEGO, Manufacturer Part Number=RC0603FR-071KL, ComponentLink1Description="Distributor Link", ComponentLink1URL=https://www.tme.eu/pl/details/rc0603fr-071k/rezystory-smd/yageo/rc0603fr-071kl/
R16: library part RES_0603, "Resistor SMD 0603", Manufacturer=YAEGO, ComponentLink1Description="Distributor Link", ComponentLink1URL=https://www.tme.eu/pl/details/rt0603fre074k75l/rezystory-smd/yageo/
R17: library part RES_0603, "Resistor SMD 0603", ComponentLink1Description="Distributor Link"
SW1 SW2 SW3: "19mm high SMD tact switch, SPST-NO", Manufacturer=Ninigi, Manufacturer Part Number=TACTM-619N-F, ComponentLink1Description="Distributor Link"
SW4 SW5: library part TACT_SWITCH_SMD, "SMD tact switch, SPST-NO", Manufacturer=JIANFU, Manufacturer Part Number=TVCM04N016BB, ComponentLink1Description="Distributor Link", ComponentLink1URL=https://www.tme.eu/pl/details/tvcm04n016bb/mikroprzelaczniki-tact/jianfu/
U1: "ESP32-C3 SoC", Manufacturer=Espressif, ComponentLink1Description="Distributor Link", ComponentLink1URL=https://www.tme.eu/pl/details/esp32c3/moduly-iot-wifi-bluetooth/espressif/esp32-c3/, ComponentLink2Description=Datasheet, ComponentLink2URL=https://www.espressif.com/sites/default/files/documentation/esp32-c3_datasheet_en.pdf, Manufacturer Part Number=ESP32-C3
U2: "32Mb Flash Memory, 133MHz; 3.3V; 8-pin SOIC 150mil package", Manufacturer=ISSI, ComponentLink1Description="Distributor Link", ComponentLink1URL=https://www.tme.eu/pl/details/is25lp032d-jnle/pamieci-flash-szeregowe/issi/, ComponentLink2Description=Datasheet, ComponentLink2URL=https://www.tme.eu/Document/dd700c5f536aa953521ad00f369a0bda/IS25LP032D-JBLA3.pdf, Manufacturer Part Number=IS25LP032D-JNLE
U3: "Ultra-low quienscent current buck-boost converter with supercap or backup battery menagement", Manufacturer="Texas Instruments", Manufacturer Part Number=TPS61094, ComponentLink1Description="Distributor Link", ComponentLink1URL=https://www.tme.eu/pl/details/tps61094dssr/regulatory-napiecia-uklady-dc-dc/texas-instruments/, ComponentLink2Description=Datasheet, ComponentLink2URL=https://www.ti.com/lit/ds/symlink/tps61094.pdf?ts=1728502352509
U4: "Light-to-digital converter", Manufacturer=ROHM, ComponentLink1Description="Distributor Link", ComponentLink1URL=https://botland.com.pl/czujniki-swiatla-i-koloru/2024-czujnik-natezenia-swiatla-bh1750-5904422373283.html, ComponentLink2Description=Datasheet, Manufacturer Part Number=BH1750
U5: "Digital pressure sensor", Manufacturer=Bosch, ComponentLink1Description="Distributor Link", ComponentLink1URL=https://botland.com.pl/czujniki-cisnienia/7245-bmp280-cyfrowy-barometr-czujnik-cisnienia-110kpa-i2cspi-33v-5904422310042.html?cd=20567593583&ad=&kd=&gad_source=1&gclid=CjwKCAjwp8--BhBREiwAj7og1-nRhMJoqo2958cRfqefQLetJBOYS6mwdGBl99UBbPsT0KdtvAyqfhoCL9cQAvD_BwE, ComponentLink2Description=Datasheet, Manufacturer Part Number=BMP280
U6: "Temperature and humidity sensor", Manufacturer=ASAIR, ComponentLink1Description="Distributor Link", ComponentLink1URL=https://botland.com.pl/cyfrowe-czujniki-temperatury/21922-fermion-czujnik-temperatury-i-wilgotnosci-aht20-dfrobot-sen0527-6959420922611.html, ComponentLink2Description=Datasheet, ComponentLink2URL=https://files.seeedstudio.com/wiki/Grove-AHT20_I2C_Industrial_Grade_Temperature_and_Humidity_Sensor/AHT20-datasheet-2020-4-16.pdf, Manufacturer Part Number=AHT20
X1: library part XTAL_32.768kHz, "32.768kHz crystal LFXTAL009678REEL", Manufacturer=IQD, Manufacturer Part Number=LFXTAL009678REEL, ComponentLink1Description="Distributor Link", ComponentLink1URL=https://www.tme.eu/pl/details/32.768k-cfpx217/rezonatory-kwarcowe-smd/iqd-frequency-products/lfxtal009678reel/, ComponentLink2Description=Datasheet, ComponentLink2URL=https://www.tme.eu/Document/9d29c46a8f969343ffbdc62856e136c9/LFXTAL009678.pdf
X2: library part XTAL_40MHz, "40MHz crystal LFXTAL035270BULK", Manufacturer=IQD, Manufacturer Part Number=LFXTAL035270BULK, ComponentLink1Description="Distributor Link", ComponentLink1URL=https://www.tme.eu/pl/details/40.00m-cfpx180/rezonatory-kwarcowe-smd/iqd-frequency-products/lfxtal035270bulk/

## Free pads (board coordinates)
  round 3.2 hole 3.2 unplated mask+0.05: MH(14,10.6) MH(14,25.6) MH(55,4)

## Via types
v1: diameter 0.65, hole 0.4, L1 (SIG/PWR) to L4 (SIG/PWR), tented both sides, 228 vias
v2: diameter 0.55, hole 0.3, L1 (SIG/PWR) to L4 (SIG/PWR), tented both sides, 60 vias
v3: diameter 0.6, hole 0.4, L1 (SIG/PWR) to L4 (SIG/PWR), tented both sides, 9 vias
v4: diameter 0.5, hole 0.3, L1 (SIG/PWR) to L4 (SIG/PWR), tented both sides, 3 vias

## Nets (pads, with @x,y where several pads share a name; then routed paths per layer and width w, separated by ;. In a path a pad name is that pad's centre, name@x,y a point inside that pad or via, vN(x,y) a via of type N, cw(c..) or ccw(c..) an arc to the next point about the centre after c; other vN are vias at no path point)
+3V3: C1.2 C2.2 C4.2 C5.2 C6.2 C7.2 C15.2 C16.2 C21.2 C22.2 C23.2 CONN1.1 L1.1 R1.2 R2.2 R3.2 R4.1 R5.1 R6.2 R7.2 R11.2 R14.2 R19.1 R20.1 R21.1 U1.11 U1.17 U1.31 U1.32 U3.9 U3.10 | length 210.2
  L1 (SIG/PWR) w0.2: U1.11 46.971,21.971 ; U1.31@47.471,16.029 U1.31
  L1 (SIG/PWR) w0.3: R11.2 10.45,11.05 16.25,16.85 ; v1(14.8,28.5) 14.8,28.2 16.6,26.4 16.6,17.2 ; C21.2 23.004,32.55 23.2,32.55 R14.2 ; R3.2 R2.2 R1.2 16.9,16.85 ; R7.2 25.9,30.602 26.061,30.764 ; R6.2 v1(42.25,29.6) R4.1 43.95,30.05 45.095,31.195 47.305,31.195 48.55,29.95 R5.1 ; 46.971,21.971 46.971,22.171 47,22.2 ; 16.25,16.85 16.9,16.85 ; 16.25,16.85 16.6,17.2 ; 16.6,17.2 16.6,17.15 16.9,16.85
  L1 (SIG/PWR) w0.4: 47,22.2 47,22.3 47.2,22.5
  L1 (SIG/PWR) w0.6: CONN1.1 5.78,26.3 C16.2 C15.2 ; v1(14.3,34.4) v1(15.7,34.4) 15.7,34.2 17.478,32.422 C23.2 ; C21.2@23.2,32.55 24.073,31.677 25.148,31.677 ; v1(28.3,31.7) v1(26.9,31.7) 26.877,31.677 25.148,31.677 ; R19.1 26.975,29.85 ; R21.1 35.4,29.733 35.933,29.2 v1(36.1,29.2) ; 38.04,25.8 C7.2@35.35,25.8 ; 38.1,25.8 38.46,25.8 40.091,27.431 44.483,27.431 44.914,27 46.2,27 47.1,26.1 v1(47.1,25.2) 47.1,24.3 47,24.2 v1(47.1,24.1) 47.2,24 47.2,22.5 48.35,23.65 C4.2 ; 38.46,25.74 41.45,22.75 C5.2 41.45,22.4 42.55,21.3 42.8,21.3 42.8,21.255 43.478,20.578 ; 47.75,16.1 47.7,16.1 U1.32@47.971,15.829 ; U1.32 48.9,15.155 C6.2 ; C6.2@49.1,14.45 49.35,14.2 v1(49.7,14.2) ; L1.1@54.771,19.3 C1.2@56.4,19.3 ; R20.1 56.1,26.05 v1(56.475,25.675) v1(57.4,24.75) 57.675,24.475 57.675,21.775 56.75,20.85 C2.2 C1.2 ; C15.2 8,28.05 v1(8,29.3) v1(7,29.3) 7.95,28.35 C15.2 ; 25.148,31.677 26.061,30.764 26.975,29.85 ; 26.975,29.85 31.025,25.8 C7.2@34.65,25.8 ; C7.2@34.65,25.8 C7.2@35.35,25.8 ; C7.2@34.65,25.8 C7.2 C7.2@35.35,25.8
  L4 (SIG/PWR) w0.6: v1(7,29.3) v1(8,29.3) ; v1@8.041,29.3 13.141,34.4 v1(14.3,34.4) v1(15.7,34.4) 14.8,33.5 v1(14.8,28.5) ; v1(36.1,29.2) 35.6,29.2 34.1,30.7 ; v1(42.25,29.6) 41.15,30.7 34.1,30.7 ; v1(47.1,24.1) 48.7,24.1 50.3,22.5 50.3,17.296 50.225,17.221 50.225,16.579 50.3,16.504 50.3,14.8 v1(49.7,14.2) ; v1(57.4,24.75) v1(56.475,25.675) 56.5,25.7 56.5,29.65 53.875,32.275 42.725,32.275 42,33 28.2,33 v1(26.9,31.7) v1(28.3,31.7) 29.3,30.7 34.1,30.7
+3V3_AHT: C34.2 C35.2 R21.2 U6.2 | length 6.3
  L1 (SIG/PWR) w0.6: R21.2@35.45,31.5 R21.2 C34.2 ; C35.2 35.7,32.95 C34.2 ; U6.2 36.85,31.5 C34.2
+3V3_BH: C32.2 C33.2 R20.2 R22.2 U4.1 U4.2 | length 8.9
  L1 (SIG/PWR) w0.3: U4.1 54.275,30.075 55.1,30.9 55.1,31.7 56.05,32.65 R22.2
  L1 (SIG/PWR) w0.6: C33.2 54.15,28.553 55.147,29.55 ; 54.2,30.4 U4.1 54.725,29.55 55.147,29.55 ; R20.2 C32.2 55.147,29.55
+3V3_BMP: C30.2 C31.2 R19.2 U5.2 U5.6 U5.8 | length 10.6
  L1 (SIG/PWR) w0.3: R19.2 R19.2@30.35,31.6 ; U5.6 31.4,30.3 31.2,30.5 31.2,31.5 31.55,31.85 U5.8 32.3,31.6 32.95,30.95 U5.2
  L1 (SIG/PWR) w0.4: 31.79,32.086 31.79,31.86 31.8,31.85 U5.8
  L1 (SIG/PWR) w0.6: R19.2 30.1,31.45 C30.2@31.79,33.14 ; 31.79,32.086 C30.2@31.79,33.14 ; C31.2 C30.2 C30.2@31.79,33.14
+3V3A: C3.2 L1.2 U1.2 U1.3 | length 8.1
  L1 (SIG/PWR) w0.2: 48.6,17.709 48.6,17.555 U1.2
  L1 (SIG/PWR) w0.25: 48.6,17.709 48.771,17.538 U1.2
  L1 (SIG/PWR) w0.6: 48.6,17.709 49.3,17.709 49.3,17.7 49.309,17.709 51.209,17.709 51.4,17.9 C3.2 51.461,17.989 52.371,18.9 53.602,18.9 54.652,17.85 L1.2
+3V3SPI: C11.2 C12.2 U1.18 U2.8 | length 8
  L1 (SIG/PWR) w0.3: 42.6,20.3 42.636,20.3 43.052,19.884 U1.18
  L1 (SIG/PWR) w0.4: 42.3,20.5 42.4,20.5 42.6,20.3
  L1 (SIG/PWR) w0.6: C11.2 C12.2 38.4,22.03 U2.8 39.93,20.5 42.3,20.5
ANTENNA: ANT1.1 C29.2 L3.2 | length 6.5
  L1 (SIG/PWR) w0.35: L3.2 55.85,15.3 C29.2 ccw(c56.55,15.35) 55.912,15.225 56.3,15.225 cw(c56.3,14.15) 57.272,14.61 cw(c56.3,14.15) 57.358,14.342 ccw(c58.143,14.742) 57.38,14.301 ccw(c58.075,14.703) 58.075,13.9 60.37,13.9
BH_RST: C19.2 R22.1 U4.5 | length 6.1
  L1 (SIG/PWR) w0.2: C19.2@53.05,32.45 C19.2
  L1 (SIG/PWR) w0.3: U4.5 50.9,30.6 50.6,30.9 50.6,31.3 51,31.7 52.05,31.7 C19.2 R22.1
DBG_D: D4.A R15.1 | length 1.7
  L1 (SIG/PWR) w0.3: D4.A R15.1
EI_SPIBUSY: CONN1.8 U1.16 | length 46.1
  L1 (SIG/PWR) w0.2: v2(43.2,22) 43.3,22.1 43.555,22.1 U1.16
  L1 (SIG/PWR) w0.3: CONN1.8 5.5,8.8 v2(8.7,8.8)
  L4 (SIG/PWR) w0.3: v2(8.7,8.8) 13.1,13.2 27.4,13.2 35.5,21.3 39.2,21.3 40,20.5 41.1,20.5 42.6,22 v2(43.2,22)
EI_SPICLK: CONN1.4 R12.1 | length 44.6
  L1 (SIG/PWR) w0.2: v2(42.3,26.4) 42.735,25.965 44.404,25.965 R12.1
  L1 (SIG/PWR) w0.3: CONN1.4 7.16,19.36 v2(9.7,21.9)
  L4 (SIG/PWR) w0.3: v2(9.7,21.9) 16.3,21.9 18.6,19.6 24.6,19.6 27.141,22.141 29.049,24.049 31.6,26.6 40.7,26.6 42.1,26.6 v2(42.3,26.4)
EI_SPICS: CONN1.5 U1.10 | length 48.6
  L1 (SIG/PWR) w0.2: U1.10 47.471,21.671 v2(48.1,22.3)
  L1 (SIG/PWR) w0.3: CONN1.5 5.12,16.8 v2(7.4,16.8)
  L4 (SIG/PWR) w0.3: v2(7.4,16.8) 7.945,16.8 8.345,16.4 26.2,16.4 34,24.2 45.2,24.2 47.1,22.3 v2(48.1,22.3)
EI_SPID: CONN1.3 R10.1 | length 43.4
  L1 (SIG/PWR) w0.2: v2(40.7,25.5) 41.54,24.66 43.099,24.66 R10.1
  L1 (SIG/PWR) w0.3: CONN1.3 v2(7.4,21.9)
  L4 (SIG/PWR) w0.3: v2(7.4,21.9) 11.3,18 25.5,18 33,25.5 v2(40.7,25.5)
EI_SPIDC: CONN1.6 U1.14 | length 45.1
  L1 (SIG/PWR) w0.2: v2(45.1,22.4) 45.471,22.029 U1.14
  L1 (SIG/PWR) w0.3: CONN1.6 7.38,14.28 v2(7.4,14.3)
  L4 (SIG/PWR) w0.3: v2(7.4,14.3) 7.7,14.3 8.2,14.8 26.9,14.8 34.3,22.2 40,22.2 40.6,22.8 44.2,22.8 44.6,22.4 v2(45.1,22.4)
EI_SPIRST: C17.2 CONN1.7 R11.1 | length 4.1
  L1 (SIG/PWR) w0.3: CONN1.7 5.91,12.55 C17.2 R11.1
FLASH_SPICLK: U1.22 U2.6 | length 3.8
  L1 (SIG/PWR) w0.2: U2.6 40.006,17.884 U1.22
FLASH_SPICS: U1.21 U2.1 | length 10.1
  L1 (SIG/PWR) w0.2: U2.1 34.48,20.5 36.4,20.5 v2(36.6,20.3) ; v2(42,18.6) 42,18.5 42.116,18.384 U1.21
  L4 (SIG/PWR) w0.2: v2(36.6,20.3) 37.5,19.4 38,19.4 38.8,18.6 v2(42,18.6)
FLASH_SPID: U1.23 U2.5 | length 4
  L1 (SIG/PWR) w0.2: U2.5 40.495,16.695 41.184,17.384 U1.23
FLASH_SPIHD: U1.19 U2.7 | length 4.2
  L1 (SIG/PWR) w0.2: U2.7 40.735,19.235 40.829,19.235 41.394,19.8 42.5,19.8 42.916,19.384 U1.19
FLASH_SPIQ: U1.24 U2.2 | length 10.3
  L1 (SIG/PWR) w0.2: U2.2 34.51,19.2 35.8,19.2 v2(36.6,18.4) ; v2(42.2,16.7) 42.384,16.884 U1.24
  L4 (SIG/PWR) w0.2: v2(36.6,18.4) 38.3,16.7 v2(42.2,16.7)
FLASH_SPIWP: U1.20 U2.3 | length 10.4
  L1 (SIG/PWR) w0.2: U2.3 34.935,17.965 35.5,17.4 37.9,17.4 39.1,18.6 40.9,18.6 41.6,19.3 42.4,19.3 42.816,18.884 U1.20
GND: ANT1.2 C1.1 C2.1 C3.1 C4.1 C5.1 C6.1 C7.1 C8.1 C9.1 C10.1 C11.1 C12.1 C13.1 C14.1 C15.1 C16.1 C17.1 C18.2 C19.1 C20.1 C21.1 C22.1 C23.1 C24.1 C25.1 C26.1 C27.1 C28.1 C29.1 C30.1 C31.1 C32.1 C33.1 C34.1 C35.1 CONN1.2 CONN2.5 CONN3.2 D1.2 D2.2 D3.K D4.K Q1.1 R13.2 R16.1 SW1.1 SW2.1 SW3.1 SW4.1 SW5.1 U1.33 U2.4 U3.7 U3.8 U3.11 U3.12 U3.13 U4.3 U5.1 U5.5 U5.7 U6.5 X2.2 X2.4 | length 243.5
  L1 (SIG/PWR) w0.3: U3.12 19.5,30.15 U3.11 ; U3.8 21.5,30.15 U3.7 ; 31.8,29.4 U5.5 ; U5.7 32.15,30.95 32.4,30.7 32.4,29.7 32.5,29.6 U5.5@31.85,29.6 ; 33.11,31.71 ccw(c33.374,31.974) 33.374,31.6 U5.1 ; C27.1 44.25,11.85 44.55,11.85 45.4,12.7 v2(45.4,13.6) ; CONN2.5 45.3,5.8 ; 53.6,31.1 U4.3 ; v1@54.7,20.6 v1(54.8,20.6)
  L1 (SIG/PWR) w0.4: v1(43.2,8.2) 43.4,8.2 43.5,8.2 45,6.7 v1(45.4,6.7) ; 45.3,5.8 45.3,6 ; v2(53.2,31.5) 53.6,31.1
  L1 (SIG/PWR) w0.6: SW1.1@4.2,1.85 v1(4.2,3.3) ; CONN1.2 6.26,24.44 ; v1(6.8,25.2) v1@6.8,24.98 ; v1(7.4,9.9) C17.1 ; v1(7.8,35.7) 8.4,35.1 8.4,34.9 ; CONN3.2 8.4,34.9 ; v1(9.5,24.9) 9.45,24.95 C16.1 v1(10.9,26.3) ; v1(9.5,29.4) 9.5,28.05 C15.1 v1(10.9,28) ; D2.2 v1@11.95,35.7 ; v1(12.1,35.7) v1@11.95,35.7 ; v1(12.2,30.3) 13.41,30.3 Q1.1 13.44,29.04 v1(13.4,29) ; SW1.1@13,1.85 v1(13,3.3) ; SW2.1@16.2,1.85 v1(16.2,3.3) ; v2(16.2,36) v2(17.5,36) ; 17.475,30.5 17.775,30.8 v2(18.5,30.8) ; v1(18.6,7.3) 18.6,8.85 D4.K ; 19.025,30.35 18.675,30 ; v1(19.2,11.2) C8.1 ; U3.12 19.5,29.9 ; 19.475,30.375 19.05,30.8 v2(18.5,30.8) ; 19.5,30.15 19.5,29.9 ; v1(21.5,11.2) C9.1 ; v4(21.5,29.2) 21.5,29.8 ; 21.5,30.15 21.5,29.8 ; C20.1@23.525,29.975 23.975,29.975 C20.1@24,30 ; v1(23.8,11.2) C10.1 ; SW2.1@25,1.85 v1(25,3.3) ; v2(25,29.4) 24.4,30 C20.1@24,30 ; C14.1@25.85,20.6 C14.1 ccw(c26.021,20.771) 26.021,20.6 v2(26.8,20.6) ; SW3.1@28.2,1.85 v1(28.2,3.3) ; D3.K v1(30.2,34.4) ; SW5.1@29.75,9.2 v1(31.2,9.2) ; 33.11,31.71 32.8,32.019 v2(32.8,32.1) 33.35,32.65 C30.1 33.35,33.85 ; v2(33.2,35.9) 33.4,35.7 C31.1@33.4,35 ; v1(34,9.2) SW5.1@35.65,9.2 ; v2(34.1,22.9) 34.547,22.9 35,23.353 ; C7.1 35,23.353 ; v2(35.3,22.9) 35,23.2 35,23.353 ; v1(35.4,35.6) C34.1 33.95,34.45 33.35,33.85 ; C11.1 36.7,24.85 v2(36.725,24.875) 37.875,24.875 v2(37.9,24.85) 38.4,24.35 C12.1 38.95,23.65 v1(39.3,23.3) 39.95,22.65 C5.1 39.95,22.15 v1(40.5,21.6) ; SW3.1@37,1.85 v1(37,3.3) ; v2(38.3,32.1) 38.3,32.08 38.63,31.75 38.65,31.75 38.9,31.5 U6.5 ; v1(38.7,35.6) 38.65,35.55 C35.1 v1(40.2,34.4) v1(40.2,35.6) 40.1,35.6 39,34.5 39.4,34.5 39.8,34.9 ; D1.2 40.65,8.631 40.994,8.975 42.75,8.975 42.75,8.65 42.9,8.5 ; v1(43.2,8.2) 43.1,8.3 v1(43.1,10) v1(43.1,11.5) v1@43.2,11.5 ; SW4.1@43.35,34.6 43.4,34.55 v1(43.4,33.4) ; v1@43.4,8.2 43.6,8.4 43.6,11.1 v1@43.2,11.5 ; 43.9,8.1 v1(43.9,9.1) C27.1@43.9,11.15 ; X2.2 44.2,9.7 43.9,9.4 C27.1@43.9,11.15 ; 46.211,6.7 46,6.7 ; C4.1 v1(48.4,26.1) ; v1(49.2,33.4) 49.2,34.55 SW4.1@49.25,34.6 ; v1(50.05,12.95) 49.1,12.95 48.75,12.6 C26.1 v1(49.9,11.5) 49.1,10.7 v1(49.1,9.7) v1(49.1,8.1) X2.4 v1(47.6,6.7) 46,6.7 ; v1(50.7,13.8) 50.75,13.85 C28.1 ; C18.2 52.275,2.2 v1(52.3,2.175) ; v1(51.1,5.35) 51.05,5.3 R13.2 v1(52.3,4) ; v1@51.1,24.1 v1(51.1,25.7) ; 51.475,26.575 51.775,26.575 ; C19.1 51.5,32.75 52.084,33.334 v2(52.084,33.665) ; v1(51.7,12.6) C28.1 ; 52.175,27.4 51.838,27.738 ; 52.325,27.85 51.775,28.4 ; v2(52.5,17) C3.1@53.05,17.55 ; v2@52.6,17.1 v2@53.5,17.1 ; C3.1 C3.1@53.05,17.55 ; C13.1 v1(54.4,35) ; v1(53.1,13.6) 52.304,13.6 cw(c52.304,14.454) C28.1 ; 54.175,26.625 53.588,26.625 v1(53.076,27.137) ; v1(54.5,13.6) 55.296,13.6 ccw(c55.296,14.454) C29.1 ; v1(54.8,20.6) 54.8,20.725 v1@55.5,21.425 ; v1(55.9,12.6) C29.1 ; 55.925,23.45 55.925,22.925 C2.1 ; C32.1 C32.1@56.45,31.05 ; 56.8,12.7 56.8,12.95 C29.1 ; v1(57.5,33) v1(57.5,32) ; v1(57.8,19.5) v1(57.8,18.7) ; v1(58,16) ANT1.2 ; 6.26,24.44 6.46,24.44 v1(6.8,24.1) v1@6.8,24.98 ; 6.26,24.44 v1@6.8,24.98 ; 8.4,34.9 v1(9.2,35.7) v1(10.6,35.7) v1@11.95,35.7 ; v2(17.5,36) 18.05,35.45 ; v2(17.5,36) v2(18.6,36) ; R16.1@17.7,30 18.675,30 ; R16.1@17.7,30 R16.1 17.4,30 v2(16.5,30.9) 18.4,30.9 v2(18.5,30.8) ; R16.1@17.7,30 v2(18.5,30.8) ; 18.05,35.45 C23.1 C22.1 ; 18.05,35.45 v2(18.6,36) ; 18.5,30.175 18.675,30 ; 18.5,30.175 v2(18.5,30.8) ; 18.5,30.175 18.675,30 ; v2(18.6,36) v2(19.9,36) ; 18.675,30 19.425,29.25 U3.13@19.438,29.263 ; 18.675,30 18.7,30 18.9,29.8 U3.13@19.438,29.263 ; U3.13@19.438,29.263 U3.13@19.5,29.325 ; U3.13@19.438,29.263 v4(19.5,29.2) U3.13@19.5,29.325 ; U3.13@19.5,29.325 19.5,29.9 ; v2(19.9,36) 20.463,35.437 ; v2(19.9,36) v2(21,36) ; C22.1 v1(21.669,34.708) C21.1 ; C22.1 20.463,35.437 ; 20.463,35.437 20.463,35.463 v2(21,36) ; v2(21,36) v2(22.3,36) ; 21.5,29.8 v2(22.4,30.7) ; v2(22.3,36) 22.876,35.424 ; v2(22.3,36) v2(23.4,36) ; v2(22.4,30.7) 21.85,30.7 21.525,30.375 22,30.375 22.037,30.338 22.375,30 C20.1@23.1,30 ; v2(22.4,30.7) v2(24.7,30.7) C20.1@24,30 ; v2(22.4,30.7) C20.1@23.1,30 ; C21.1 24.092,34.708 v1(24.1,34.7) 24.708,35.308 ; C21.1 22.876,35.424 ; 22.876,35.424 22.876,35.476 v2(23.4,36) ; C20.1@23.1,30 C20.1 C20.1@24,30 ; v2(23.4,36) v2(24.7,36) ; v2(24.7,36) 24.808,36 v1(25.5,35.308) 24.708,35.308 ; v2(24.7,36) 24.7,35.316 24.708,35.308 ; 33.35,33.85 C31.1 ; C31.1 33.35,34.95 C31.1@33.4,35 ; C31.1 33.4,34.95 C31.1@33.4,35 ; v1@43.2,11.5 C27.1 C27.1@43.9,11.15 ; 46,6.7 45.3,6 45.3,6.6 v1(45.4,6.7) 46,6.7 ; v1(51.1,25.7) 51.1,26.8 v1(51.4,27.1) ; v1(51.1,25.7) 51.55,26.15 C25.1 ; v1@51.3,28.275 51.838,27.738 ; v1@51.3,28.275 51.3,27.2 v1(51.4,27.1) ; v1@51.3,28.275 v1(51.3,28.4) ; v1(51.3,28.4) 51.775,28.4 ; v1(51.3,28.4) 51.775,28.4 ; v1(51.4,27.1) 51.4,27.3 51.838,27.738 ; v1(51.4,27.1) 52.3,27.1 ; 51.775,26.575 52.3,27.1 ; 51.775,26.575 C25.1 ; 51.775,28.4 C33.1 C33.1@52.65,27.962 ; C25.1 C25.1@52.2,26.261 ; C25.1@52.2,26.261 52.311,26.15 53,26.15 ; C25.1@52.2,26.261 v1@53.039,27.1 ; 52.3,27.1 52.337,27.137 v1(53.076,27.137) ; 52.3,27.1 v1@53.039,27.1 ; C33.1@52.65,27.962 53.475,27.137 ; C33.1@52.65,27.962 52.65,27.563 v1(53.076,27.137) ; 53,26.15 C24.1 ; 53,26.15 53.076,26.226 v1@53.076,26.974 ; v1@53.039,27.1 v1(53.076,27.137) ; C3.1@53.05,17.55 v2@53.5,17.1 ; v1@53.076,26.974 C24.1 ; v1@53.076,26.974 v1(53.076,27.137) ; v1(53.076,27.137) 53.475,27.137 ; 53.475,27.137 54.563,27.137 v1(54.6,27.1) 54.6,26.1 ; v2@53.5,17.1 v2(53.575,17.025) 53.65,16.95 v2(55.05,16.95) v2(56.525,16.95) 56.5,16.975 C1.1 ; C24.1 54.55,26.15 54.6,26.1 ; 54.6,26.1 v1(55,25.7) 55,24.8 v1(55.5,24.3) ; v1@55.5,21.425 55.5,22.375 ; v1@55.5,21.425 C2.1@56.425,22.35 ; 55.5,22.375 v1(55.5,24.3) ; 55.5,22.375 55.525,22.35 C2.1@56.425,22.35 ; v1(55.5,24.3) 56.3,23.5 v1(56.5,23.5) C2.1 ; C2.1@56.425,22.35 C2.1 ; C32.1@56.45,31.05 56.975,31.575 ; C32.1@56.45,31.05 v1@57.45,31.05 ; C1.1 56.95,17.85 C1.1@57,17.9 ; C1.1 56.55,17.9 C1.1@57,17.9 ; 56.975,31.575 57.4,32 v1(57.5,32) ; 56.975,31.575 57.45,31.1 v1@57.45,31.05 ; C1.1@57,17.9 v1(57.8,18.7) ; C1.1@57,17.9 v1(57.8,17.9) v1(57.8,18.7) ; v1@57.45,31.05 v1(57.5,31) v1(57.5,32) ; v1(30.5,28.5) 30.9,28.5 31.8,29.4 v1(31.8,28.5) v1(30.5,28.5)
  L1 (SIG/PWR) w1: CONN3.2 10.5,34.25 D2.2
  other v1: 53.4,1.3 54.7,1.3 56,1.3 6.582,2.307 7.982,2.307 9.382,2.307 10.782,2.307 19.182,2.307 20.582,2.307 21.982,2.307 30.382,2.307 31.782,2.307 33.182,2.307 34.582,2.307 5.882,3.707 7.282,3.707 8.682,3.707 10.082,3.707 11.482,3.707 18.482,3.707 19.882,3.707 21.282,3.707 22.682,3.707 29.682,3.707 31.082,3.707 32.482,3.707 33.882,3.707 35.282,3.707 6.582,5.107 7.982,5.107 9.382,5.107 10.782,5.107 30.382,5.107 31.782,5.107 33.182,5.107 34.582,5.107 56.3,6.4 50.5,6.5 19.882,6.507 21.282,6.507 22.682,6.507 52.082,6.507 53.482,6.507 54.882,6.507 49.1,6.7 8.7,7.6 10.9,7.6 56.3,7.6 16.382,7.907 51.382,7.907 52.782,7.907 54.182,7.907 9.9,8.8 56.3,8.8 50.5,9.1 52.1,9.1 53.5,9.1 54.9,9.1 28,9.2 32.6,9.2 11.482,9.307 26.8,10 56.3,10 51.4,10.3 52.8,10.3 54.2,10.3 56.3,11.2 52.1,11.4 53.5,11.4 54.9,11.4 16.2,12.3 53.1,12.6 54.5,12.6 10.782,13.507 8.449,13.551 14.9,14 16.5,14 32.5,14.25 33.75,14.25 35,14.25 31.082,14.907 36.25,15.25 7.414,15.555 9.5,15.6 11.2,15.6 12.9,15.6 17,15.6 38.5,15.7 39.5,15.7 33,15.8 34,15.8 35,15.8 33,16.7 12.3,17.2 14,17.2 10.082,17.707 7.4,18 8.6,18 12.182,19.107 13.582,19.107 14.982,19.107 12.882,20.507 14.282,20.507 15.682,20.507 6.9,20.8 10.2,20.8 55.575,21.563 30.382,21.907 55.625,22.963 7.4,23.1 9.7,23.1 29.682,23.307 11.1,23.5 12.4,23.5 15.6,23.5 42.4,23.5 51.1,24.125 33.182,24.707 41.9,25.3 57.682,26.107 26.8,26.5 43.5,26.6 48,27.1 6.582,27.507 27.582,27.507 26.8,28.4 4.482,28.907 5.882,28.907 57.682,28.907 38.9,29.3 3.782,30.307 46.2,30.5 4.482,31.707 3.782,33.107 4.482,34.507 45.082,34.507 46.482,34.507 56.282,34.507 19.256,34.708
  other v2: 37.8,18.4 37.8,20.3 34.3,34.9 34.3,35.9
  other v3: 45.121,17.534 46.221,17.534 47.321,17.534 45.121,18.634 46.221,18.634 47.321,18.634 45.121,19.734 46.221,19.734 47.321,19.734
  other v4: 20.5,29.2
LNA: C28.2 L3.1 U1.1 | length 4.6
  L1 (SIG/PWR) w0.25: C28.2@51.445,15.35 C28.2
  L1 (SIG/PWR) w0.35: U1.1@49.193,16.826 cw(c48.771,15.327) 49.872,16.428 50.6,15.7 ccw(c51.445,16.545) C28.2@51.445,15.35 ; C28.2 C28.2@51.747,15.35 ; C28.2@51.798,15.299 C28.2@51.747,15.35 ; L3.1 53.1,15.35 C28.2@51.747,15.35
MCU_BOOT: C14.2 R7.1 SW5.2 U1.15 | length 48.7
  L1 (SIG/PWR) w0.2: R7.1 R7.1@25.95,23.9 ; U1.15 44.971,21.652 43.4,23.223 43.4,23.918 45.712,26.23 45.77,26.23 v2(45.8,26.2)
  L1 (SIG/PWR) w0.3: R7.1 C14.2 26.55,22.15 28.2,20.5 28.2,13.75 29.75,12.2 SW5.2@35.65,12.2 ; R7.1@25.95,23.9 27,23.9 v2(27.4,24.3)
  L4 (SIG/PWR) w0.3: v2(27.4,24.3) 27.4,24.8 30.2,27.6 44.4,27.6 v2(45.8,26.2)
MCU_CE: C13.2 R6.1 SW4.2 U1.7 | length 26.2
  L1 (SIG/PWR) w0.2: U1.7 49.484,19.884 49.9,20.3 49.9,29 49.5,29.4 49.5,31.35 SW4.2@49.25,31.6
  L1 (SIG/PWR) w0.3: R6.1 42.7,32.25 43.35,31.6 43.55,31.8 49.05,31.8 49.25,31.6 50.5,32.85 50.5,34.2 51.3,35 C13.2@51.754,35
MCU_SPICLK: R12.2 U1.12 | length 4.2
  L1 (SIG/PWR) w0.2: R12.2 45.53,23.87 46.471,22.929 U1.12
MCU_SPID: R10.2 U1.13 | length 3.5
  L1 (SIG/PWR) w0.2: R10.2 44.762,23.838 45.971,22.629 U1.13
MCU_SW0: C8.2 R1.1 SW1.2 U1.9 | length 63.3
  L1 (SIG/PWR) w0.2: R1.1 19.65,15.35 20.45,16.15 24.75,16.15 ; U1.9 48.087,21.3 v2(48.7,21.3)
  L1 (SIG/PWR) w0.3: SW1.2@4.2,6.35 13,6.35 13.45,6.35 17.9,10.8 17.9,13.2 18.7,14 C8.2 R1.1 ; 24.75,16.15 26.1,16.15 26.8,15.45 v2(26.8,11.9)
  L4 (SIG/PWR) w0.3: v2(26.8,11.9) 27.7,11 34.6,11 37.475,13.875 42.575,13.875 43.5,14.8 43.5,20.4 44.4,21.3 v2(48.7,21.3)
MCU_SW1: C9.2 R2.1 R15.2 SW2.2 U1.27 | length 45.3
  L1 (SIG/PWR) w0.2: v2(43.1,13.4) 43.1,13.5 44.1,14.5 44.8,14.5 45.471,15.171 45.471,15.701 U1.27
  L1 (SIG/PWR) w0.3: SW2.2@16.2,6.35 16.95,5.6 24.25,5.6 25,6.35 25,7.8 v2(25.1,7.9) 24.75,7.9 R15.2 22.5,10.15 22.5,12.95 C9.2 R2.1
  L4 (SIG/PWR) w0.3: v2(25.1,7.9) 34.3,7.9 35.9,9.5 35.9,10.8 38.2,13.1 42.8,13.1 v2(43.1,13.4)
MCU_SW2: C10.2 R3.1 SW3.2 U1.28 | length 35.8
  L1 (SIG/PWR) w0.2: v2(44.2,13) 44.2,13.3 45.971,15.071 U1.28
  L1 (SIG/PWR) w0.3: R3.1 C10.2 24.9,12.85 24.9,9.65 28.2,6.35 37,6.35 37.2,6.55 v2(37.2,7.8)
  L4 (SIG/PWR) w0.3: v2(37.2,7.8) 37.4,8 37.4,10.8 39,12.4 43.7,12.4 44.2,12.9 v2(44.2,13)
MCU_USB_D_N: R8.1 U1.25 | length 6
  L1 (SIG/PWR) w0.25: 44.314,15.81 44.471,15.967 U1.25
  L1 (SIG/PWR) w0.35: R8.1 40.295,14.145 40.295,14.594 41.511,15.81 44.314,15.81
MCU_USB_D_P: R9.1 U1.26 | length 5.9
  L1 (SIG/PWR) w0.25: 44.9,15.4 44.971,15.471 U1.26
  L1 (SIG/PWR) w0.35: R9.1 41.005,14.145 41.005,14.3 41.805,15.1 44.6,15.1 44.9,15.4
PWR_D: D3.A R14.1 | length 1.9
  L1 (SIG/PWR) w0.3: R14.1 26.5,34.05 D3.A
SCL: R4.2 U1.6 U4.6 U5.4 U6.3 | length 35.8
  L1 (SIG/PWR) w0.2: R4.2@45.4,29.55 R4.2 ; U1.6 49.584,19.384 50.307,20.107 50.307,29.007 ; v2(50.3,30) 50.307,29.993 50.307,29.007 ; U4.6 50.307,29.007
  L1 (SIG/PWR) w0.3: v2(33.4,29.1) U5.4 ; U6.3 37.2,29.7 v2(37.6,29.3) ; R4.2@45.4,29.55 46.2,28.75 v2(46.2,28.7)
  L4 (SIG/PWR) w0.3: v2(33.4,29.1) 34,29.1 34.8,28.3 38.6,28.3 ; v2(37.6,29.3) 38.6,28.3 ; v2(50.3,30) 49,28.7 v2(46.2,28.7) 46.1,28.7 45.7,28.3 38.6,28.3
SDA: R5.2 U1.8 U4.4 U5.3 U6.4 | length 38
  L1 (SIG/PWR) w0.2: U1.8 49.284,20.384 49.474,20.574 49.474,27.026 v2(49.2,27.3) ; U4.4 52.3,31.1 53.1,30.3 v2(53.1,30.2)
  L1 (SIG/PWR) w0.3: U5.3 33.9,30.3 34.2,30 34.2,28.9 34.8,28.3 41.4,28.3 ; U6.4 41.4,28.3 ; R5.2 47.05,29.45 48.6,27.9 ; v2(49.2,27.3) 48.6,27.9 ; 41.4,28.3 45.3,28.3 45.7,27.9 48.6,27.9
  L4 (SIG/PWR) w0.3: v2(49.2,27.3) 51.2,29.3 52.2,29.3 v2(53.1,30.2)
SHLD: C18.1 CONN2.6 R13.1 | length 17.1
  L1 (SIG/PWR) w0.3: CONN2.6@41.5,4.75 41.5,3.05 40.5,2.05 43,2.05 45,2.05 CONN2.6@47.5,2.05 ; CONN2.6@46.5,4.75 46.5,3.05 CONN2.6@47.5,2.05 ; R13.1 C18.1 47.65,2.2 CONN2.6@47.5,2.05
TPS_OSEL: R16.2 U3.1 | length 1.9
  L1 (SIG/PWR) w0.3: R16.2 17.7,28.25 U3.1
TPS_SW: L2.1 U3.5 | length 2.8
  L1 (SIG/PWR) w0.25: U3.5 21.25,25.95 L2.1
USB_N: CONN2.2 D1.1 | length 5.9